# Altium PCB PWR Board 10A.PcbDoc (part 1 of 10)
Units mm, origin at the board's own origin, x right, y up, seen from the top; angles counter-clockwise.
Board outline 355 x 325 mm, 4 copper layers (Top Layer, Layer 1, Layer 2, Bottom Layer), stack 1.636 mm thick; 617 components, 308 nets, 1518 pads, 1199 vias.
Unrouted connection lines stored in the file: 361.
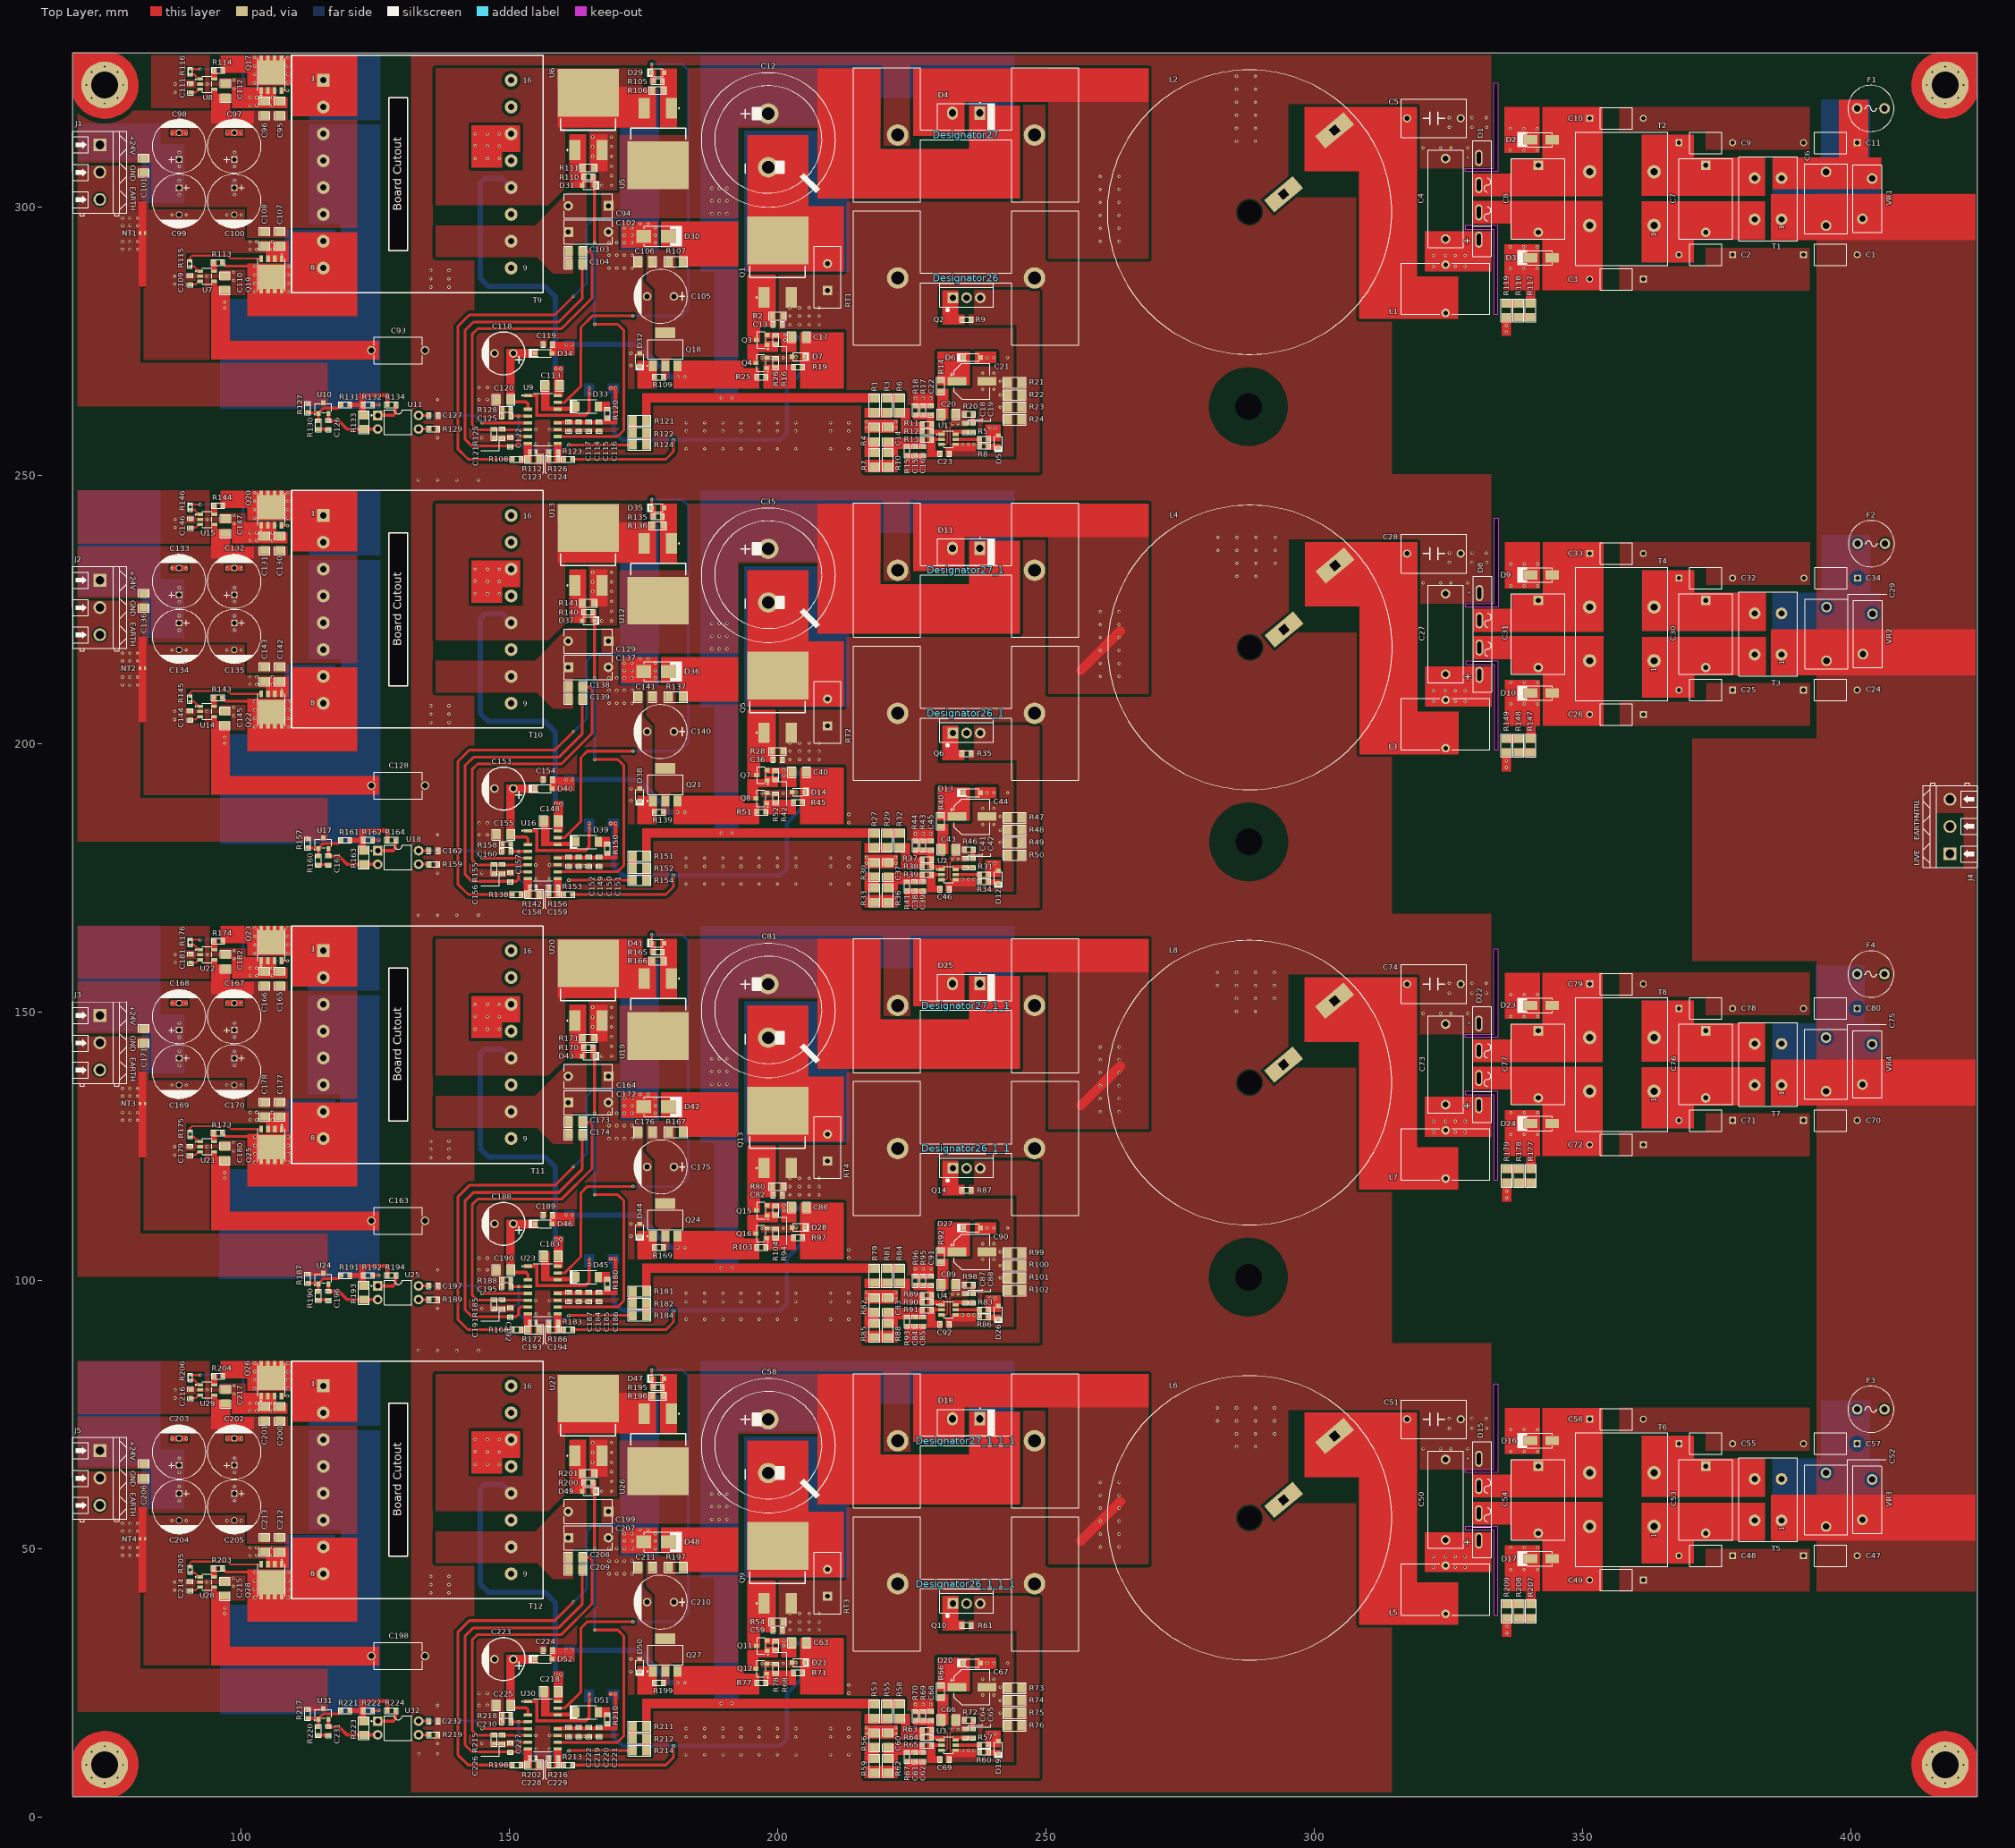
[diagram p0: Top Layer view]
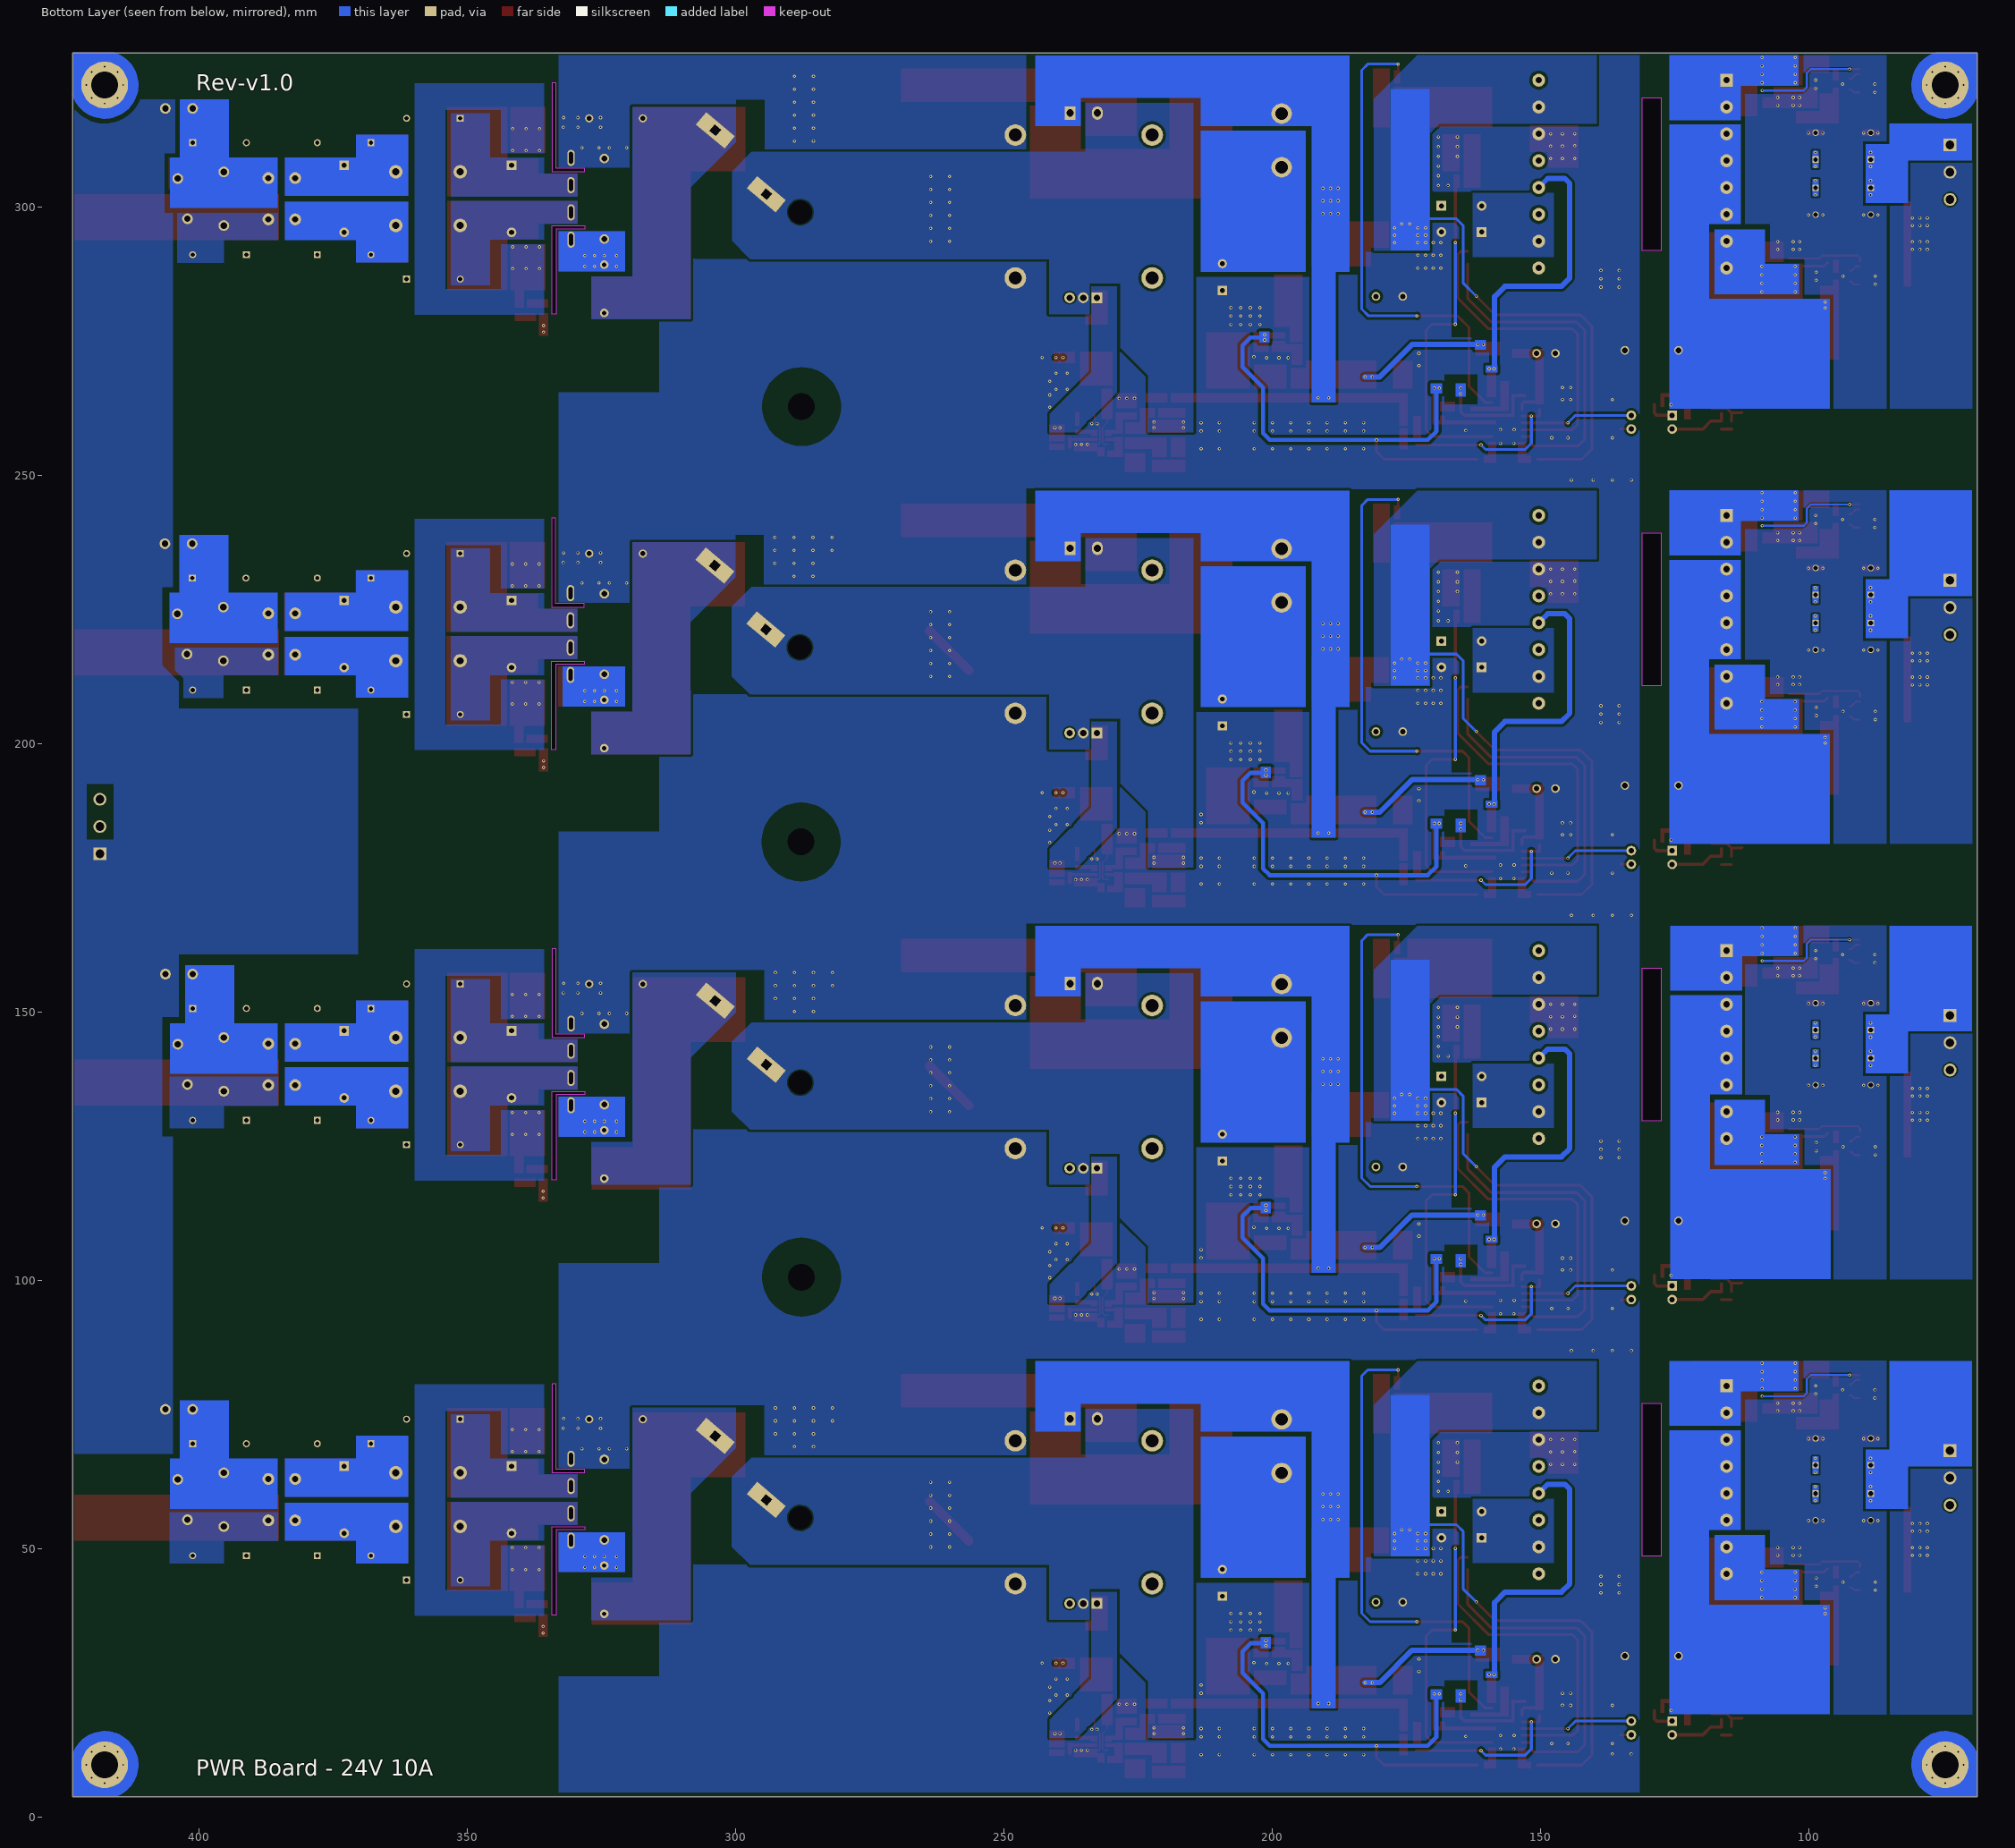
[diagram p1: Bottom Layer view, seen from below]
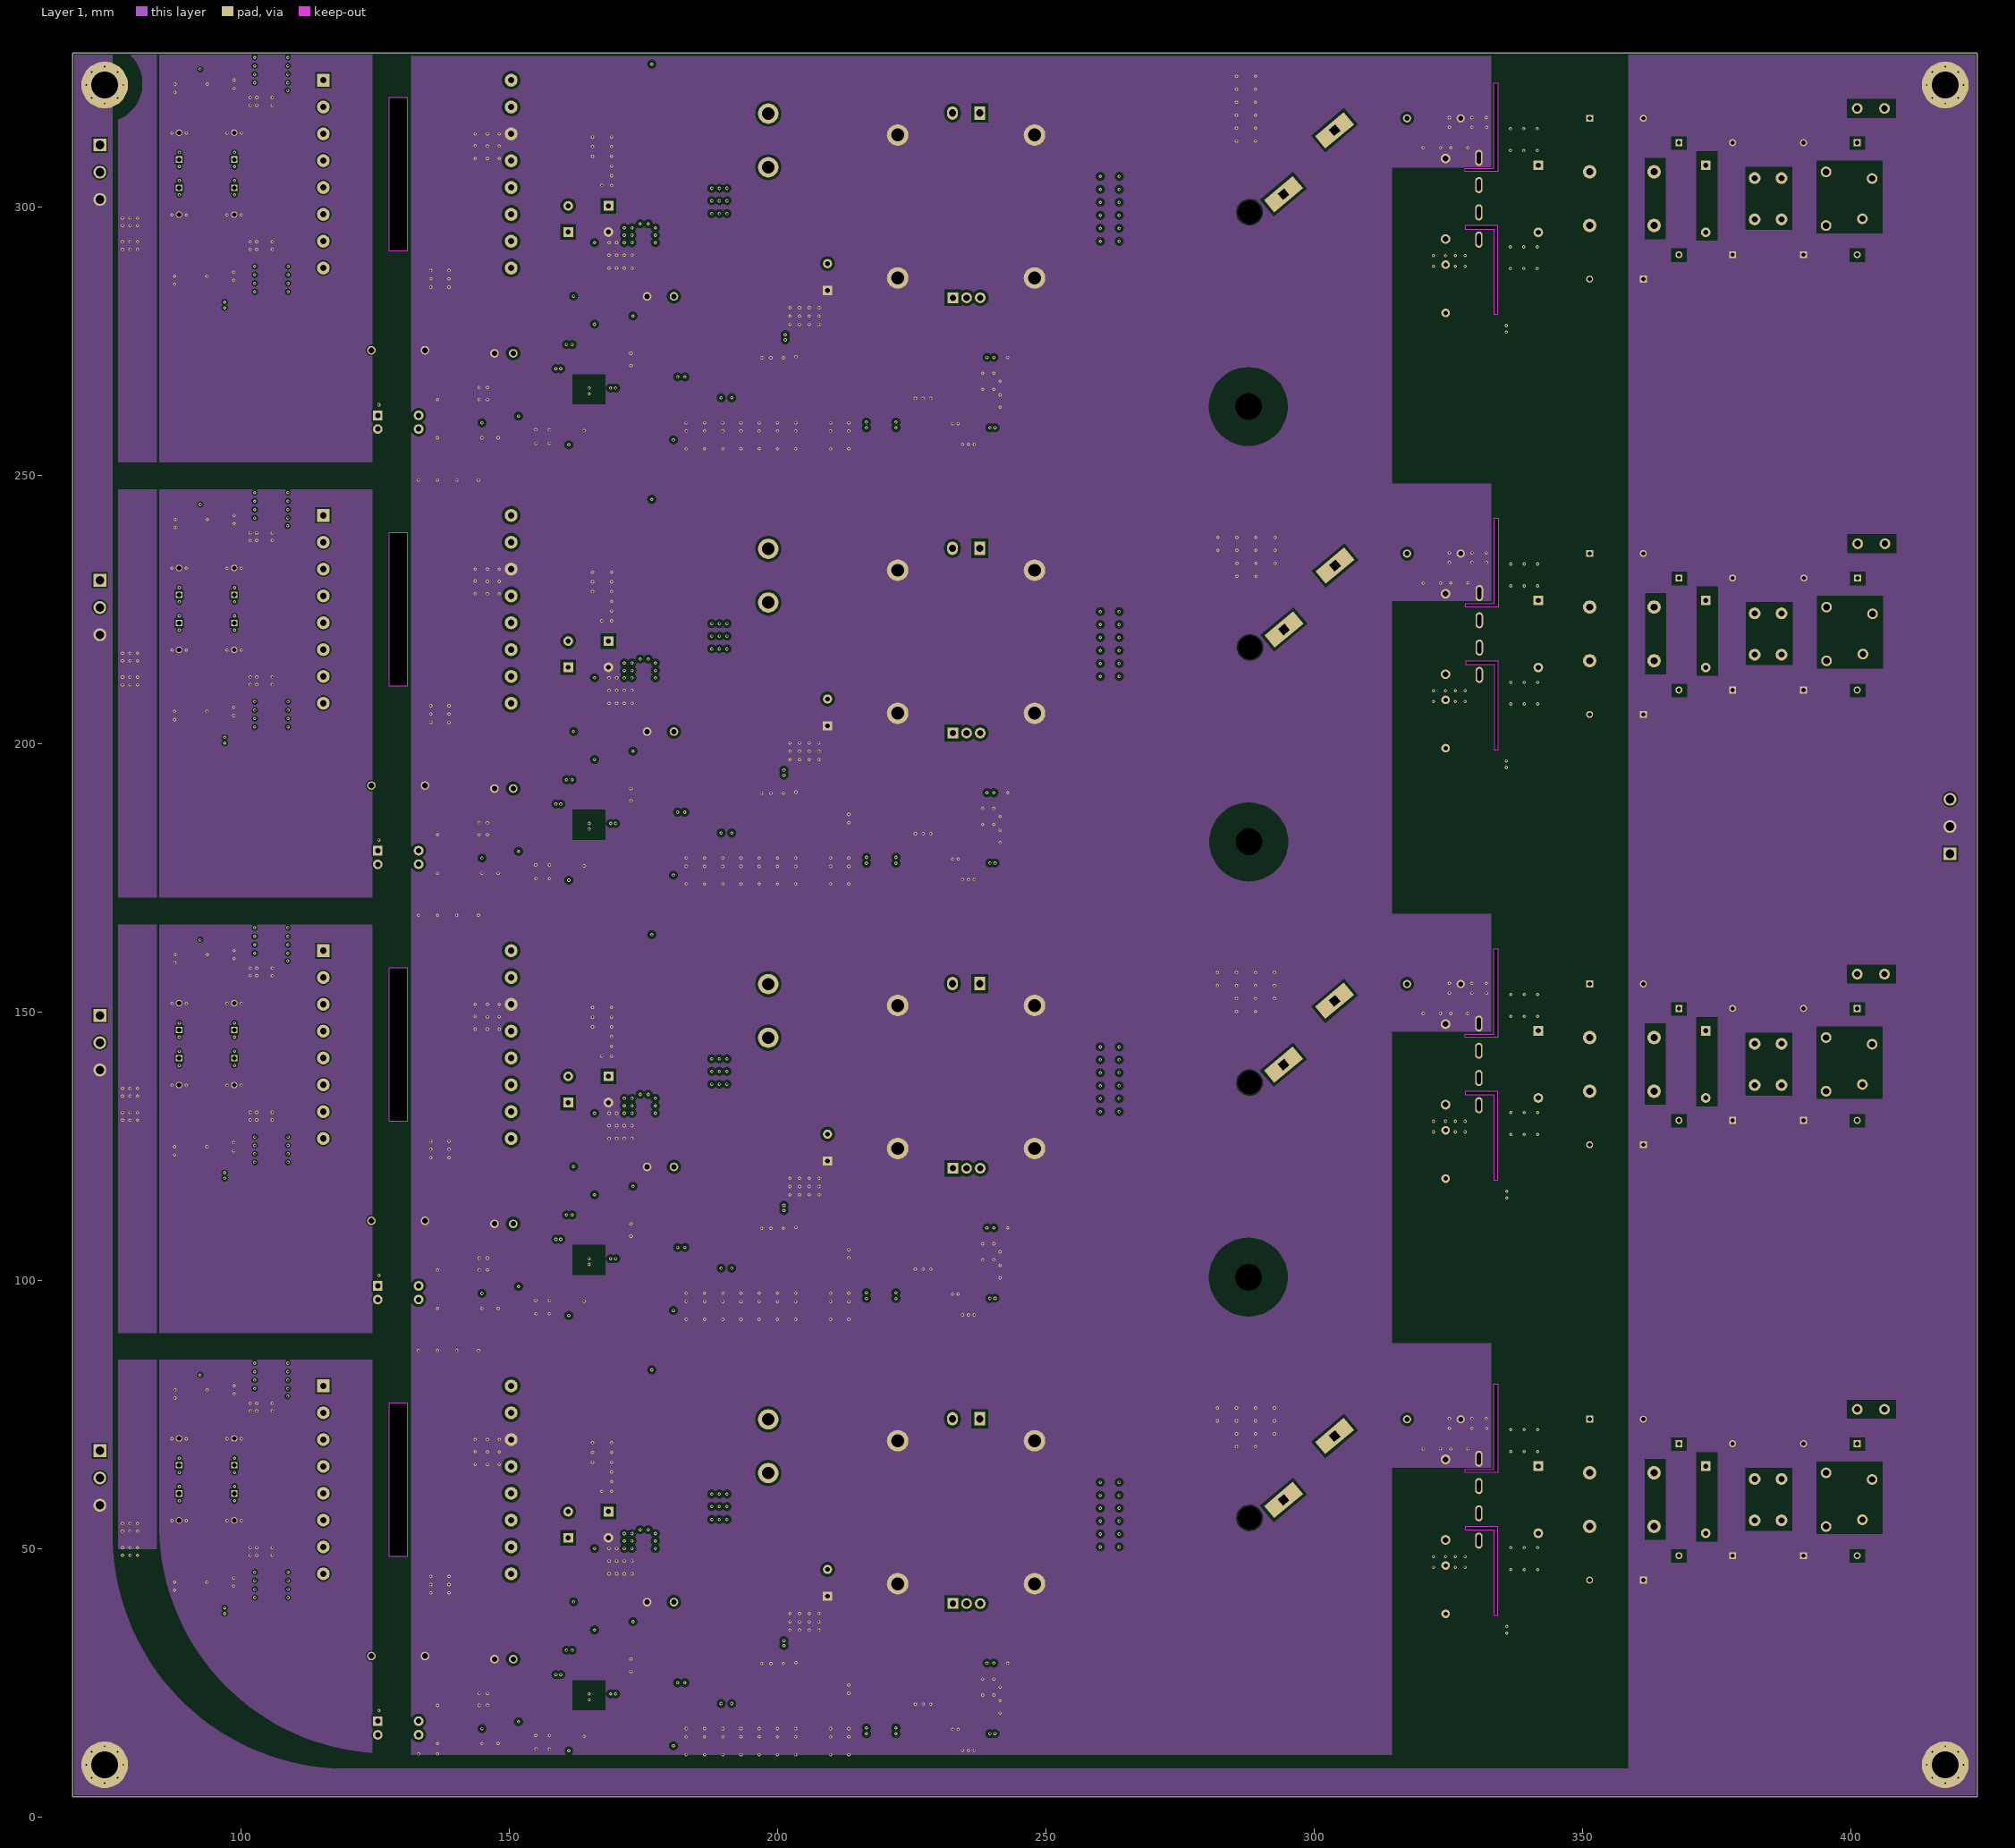
[diagram p2: Layer 1]
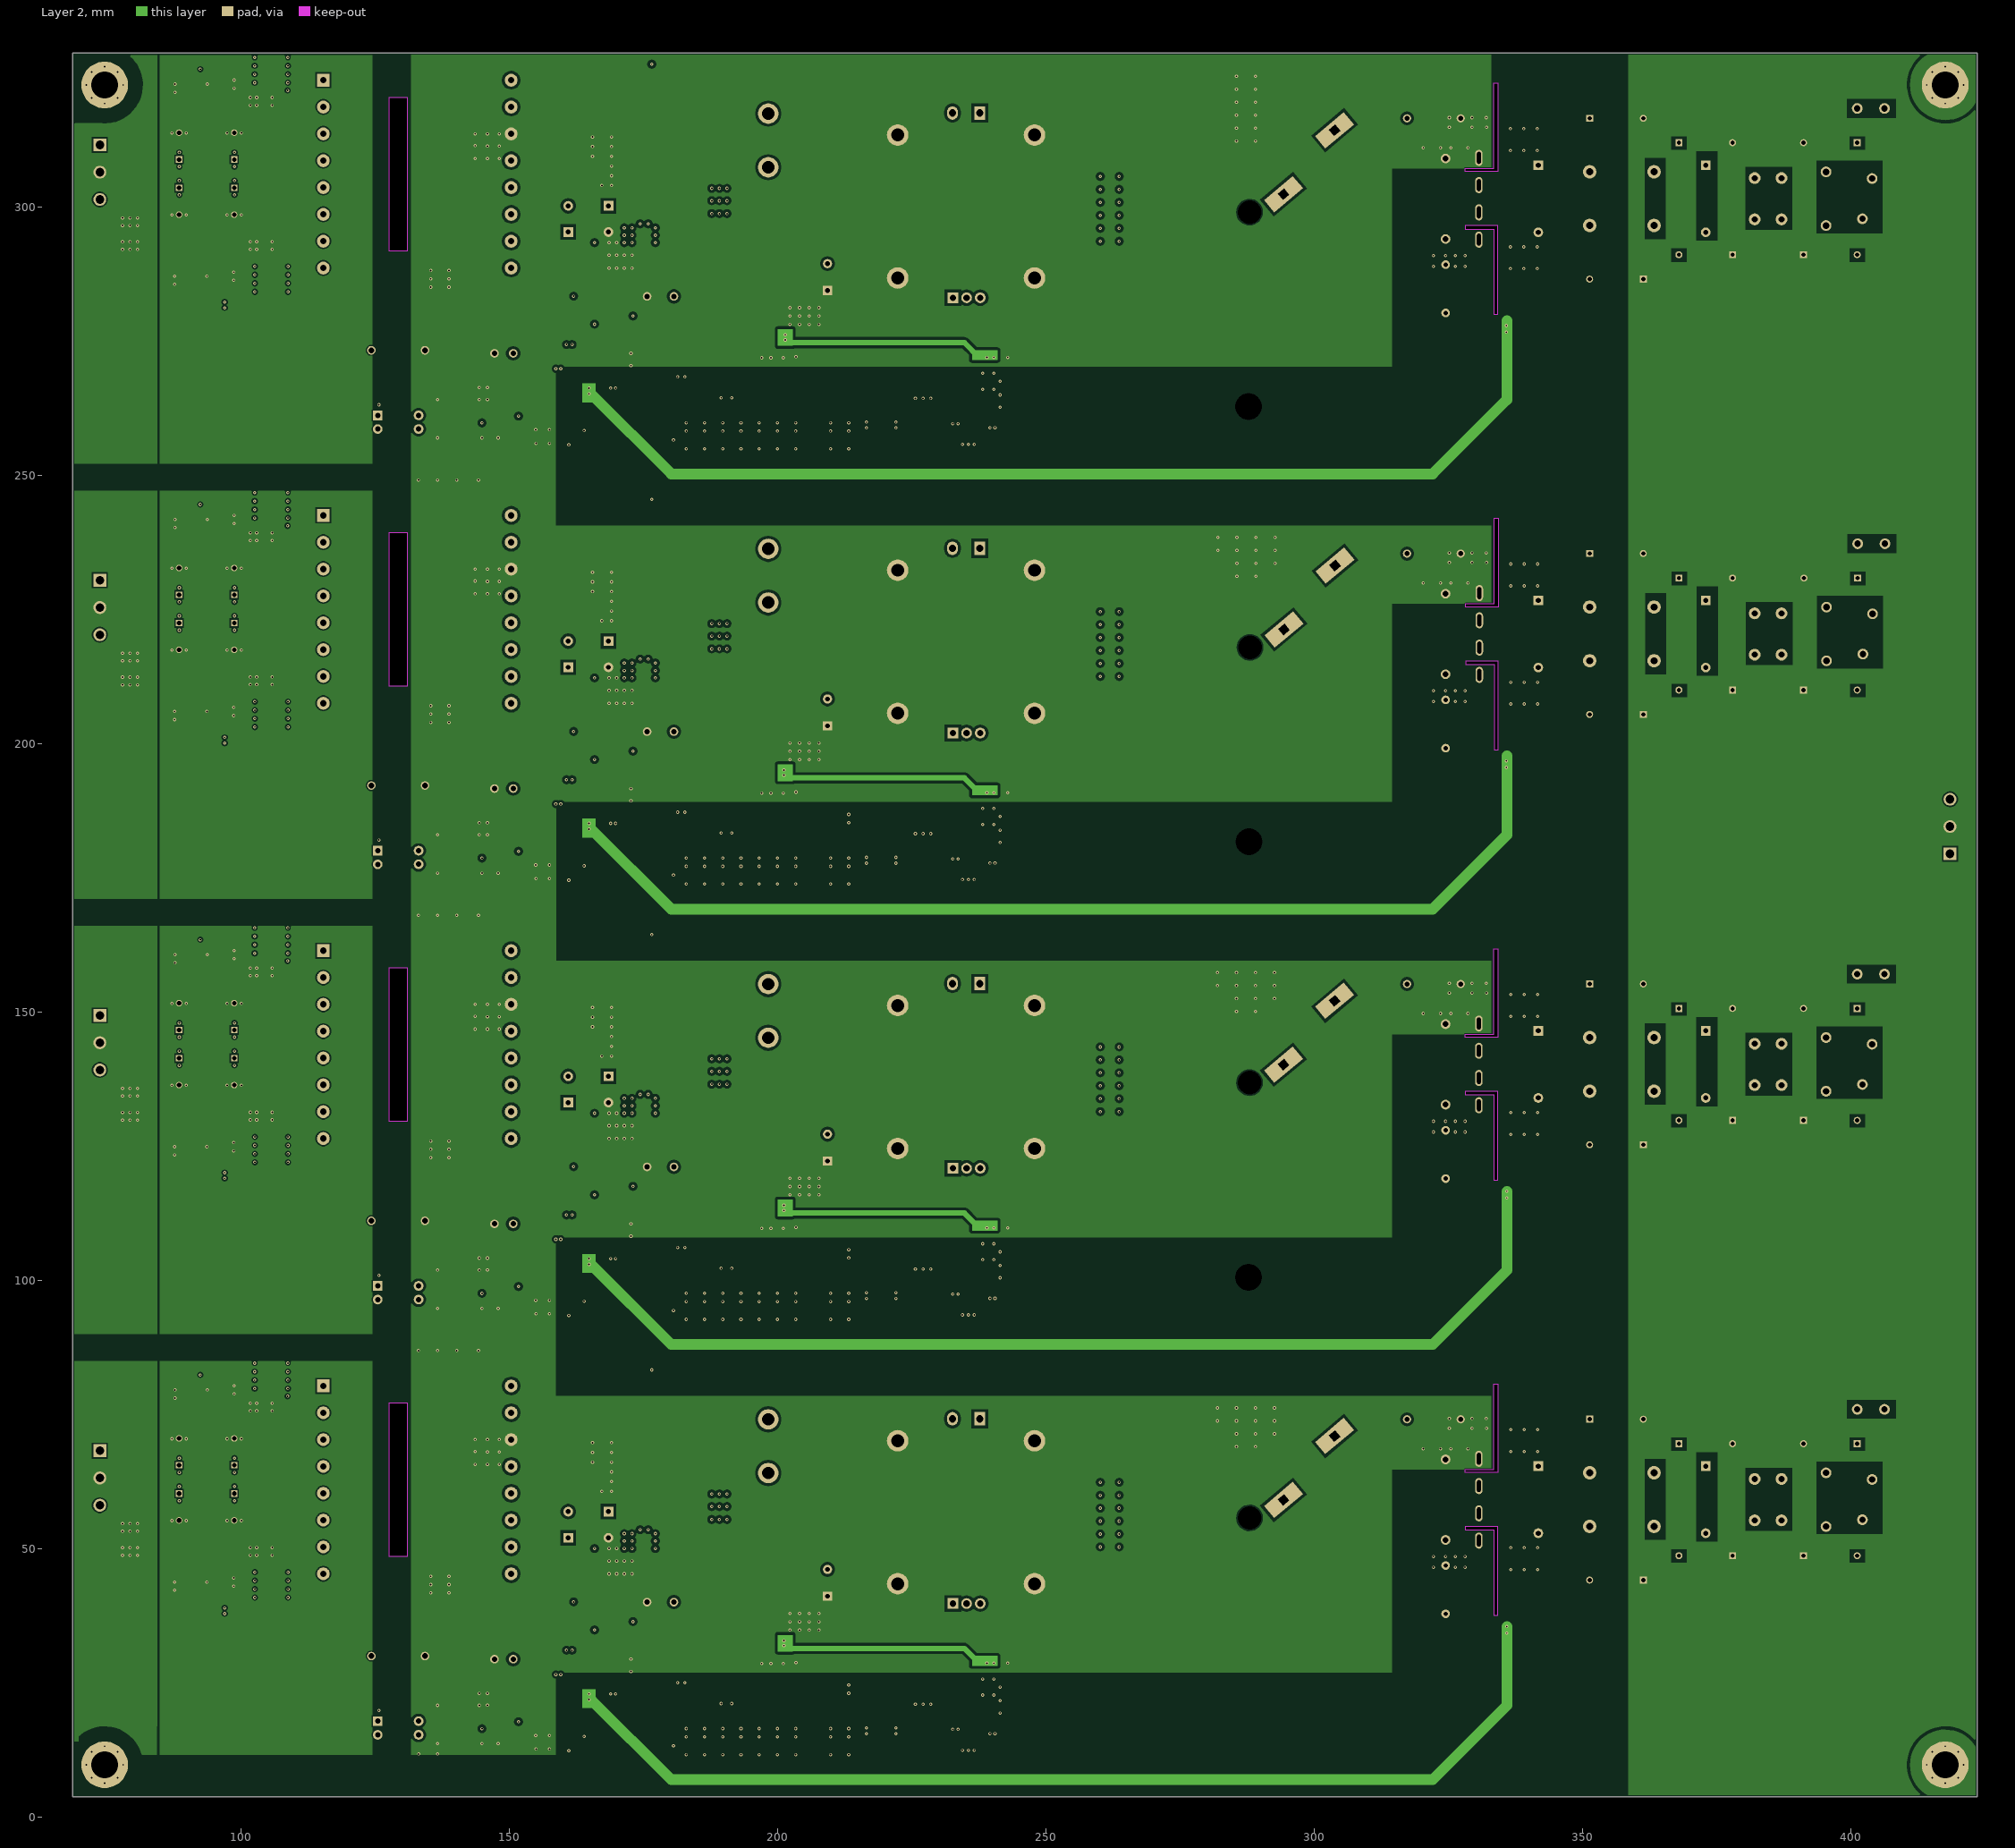
[diagram p3: Layer 2]
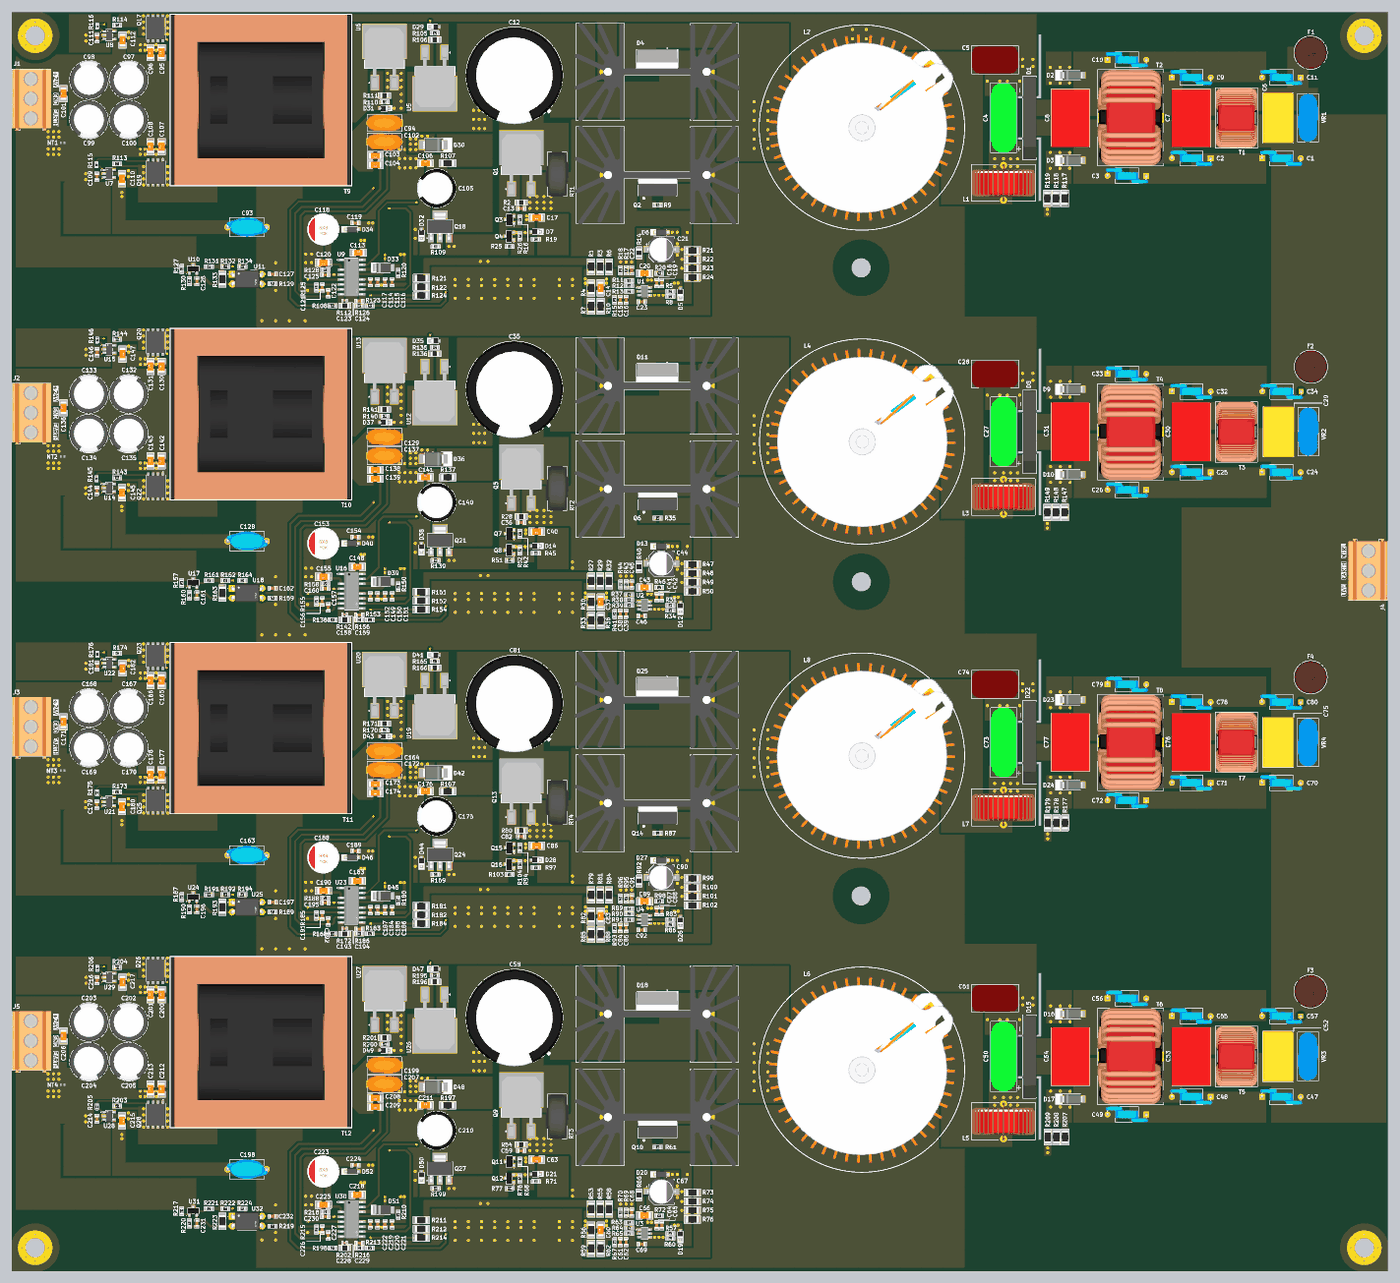
[diagram p9: 3D render of the assembled board from above, using the file's embedded part models]

## Layer stack, top to bottom
Top Solder: solder mask 0.0102, Solder Resist, Dk 3.5
Top Layer: signal copper 0.07
Dielectric 2: prepreg 0.203, PP-006, Dk 4.1
Layer 1: signal copper 0.03
Dielectric 1: core 1.03, FR-4, Dk 4.8
Layer 2: signal copper 0.03
Dielectric 3: prepreg 0.203, PP-006, Dk 4.1
Bottom Layer: signal copper 0.07
Bottom Solder: solder mask 0.0102, Solder Resist, Dk 3.5

## Board outline
68.618,3.682 68.618,328.682 423.618,328.682 423.618,3.682
cut-out: 328.137,295.845 333.492,295.845 333.492,279.935 334.239,279.935 334.239,296.445 328.137,296.445
cut-out: 328.137,306.525 328.137,307.125 333.492,307.125 333.492,323.035 334.239,323.035 334.239,306.525
cut-out: 328.224,214.742 333.579,214.742 333.579,198.832 334.326,198.832 334.326,215.342 328.224,215.342
cut-out: 328.224,225.422 328.224,226.022 333.579,226.022 333.579,241.932 334.326,241.932 334.326,225.422
cut-out: 328.137,53.441 333.492,53.441 333.492,37.531 334.239,37.531 334.239,54.041 328.137,54.041
cut-out: 328.137,64.121 328.137,64.721 333.492,64.721 333.492,80.631 334.239,80.631 334.239,64.121
cut-out: 328.137,145.223 328.137,145.823 333.492,145.823 333.492,161.734 334.239,161.734 334.239,145.223
cut-out: 328.137,134.544 333.492,134.544 333.492,118.633 334.239,118.633 334.239,135.144 328.137,135.144

## Design rules (kind name [scope] priority, off if disabled: settings)
BoardOutlineClearance [All] p1: gap=0 ignorepadtopadclearanceinfootprint=FALSE except(0.381: Poly-OutlineEdge)
Clearance "GND Clearance" [InNet('GND')] p1: gap=0.254 ignorepadtopadclearanceinfootprint=FALSE except(0.508: Arc-Poly Track-Poly SMDPad-Poly THPad-Poly Via-Poly Fill-Poly Poly-Poly)
Clearance [All] p2: gap=0.254 ignorepadtopadclearanceinfootprint=FALSE
ComponentClearance [All] p1: gap=0 collisioncheckmode=3 verticalgap=0 showdistances=FALSE
Height [All] p1: minheight=0 maxheight=40.5 prefheight=1.016
HoleSize [All] p1: absolutevalues=TRUE maxlimit=5.5 minlimit=0.025 maxpercent=80.000 minpercent=20.000
MinimumSolderMaskSliver [All] p1: minsoldermaskwidth=0
PolygonConnect [All] p1: connectstyle=Direct reliefconductorwidth=0.254 reliefentries=4 polygonreliefangle="90 Angle" airgapwidth=0.254
RoutingVias [All] p1: holewidth=0.3 width=0.6 viastyle="Through Hole" minholewidth=0.3 minwidth=0.6 maxholewidth=0.3 maxwidth=0.6
SilkToSilkClearance [All] p1: silktosilkclearance=0
SilkToSolderMaskClearance [IsPad] p1: minsilkscreentomaskgap=0 clearancetoexposedcopper=TRUE
SolderMaskExpansion [All] p1: expansion=0.102 istentingtop=FALSE
SupplyNets "Schematic Supply Nets_7" [InNet('GND')] p1: voltage=0.000
SupplyNets "Schematic Supply Nets_6" [InNet('SGND-C1')] p2: voltage=0.000
SupplyNets "Schematic Supply Nets_5" [InNet('SGND-C3')] p3: voltage=0.000
SupplyNets "Schematic Supply Nets_4" [InNet('SGND-C4')] p4: voltage=0.000
SupplyNets "Schematic Supply Nets_3" [InNet('EARTH')] p5: voltage=0.000
SupplyNets "Schematic Supply Nets_2" [InNet('SGND-C2')] p6: voltage=0.000
SupplyNets "Schematic Supply Nets_1" [InNet('AC_N')] p7: voltage=0.000
SupplyNets "Schematic Supply Nets" [InNet('AC_L')] p8: voltage=0.000
UnRoutedNet [All] p1: checkbadconnections=TRUE
Width [All] p1: maxlimit=2 minlimit=0.203 preferedwidth=0.254 toplayer_minwidth=0.203 minimp=50.000000 maximp=50.000000 favimp=50.000000
23 further rules are at their usual default settings.

## Classes and differential pairs
component class U_Power_Sheet4: C47 C48 C49 C50 C51 C52 C53 C54 C55 C56 C57 C58 C59 C60 C61 C62 C63 C64 C65 C66 C67 C68 C69 D15 D16 D17 D18 D19 D20 D21 F3 L5 L6 Q9 Q10 Q11 Q12 R53 R54 R55 R56 R57 R58 R59 R60 R61 R62 R63 R64 R65 R66 R67 R68 R69 R70 R71 R72 R73 R74 R75 R76 R77 R78 RT3 T5 T6 U3 VR3
component class U_Power_Sheet3: C70 C71 C72 C73 C74 C75 C76 C77 C78 c79 C80 C81 C82 C83 C84 C85 C86 C87 C88 C89 C90 C91 C92 D22 D23 D24 D25 D26 D27 D28 F4 L7 L8 Q13 Q14 Q15 Q16 R79 R80 R81 R82 R83 R84 R85 R86 R87 R88 R89 R90 R91 R92 R93 R94 R95 R96 R97 R98 R99 R100 R101 R102 R103 R104 RT4 T7 T8 U4 VR4
component class U_Power_Sheet2: C24 C25 C26 C27 C28 C29 C30 C31 C32 C33 C34 C35 C36 C37 C38 C39 C40 C41 C42 C43 C44 C45 C46 D8 D9 D10 D11 D12 D13 D14 F2 L3 L4 Q5 Q6 Q7 Q8 R27 R28 R29 R30 R31 R32 R33 R34 R35 R36 R37 R38 R39 R40 R41 R42 R43 R44 R45 R46 R47 R48 R49 R50 R51 R52 T3 T4 U2 VR2
component class U_Power_Sheet1: C1 C2 C3 C4 C5 C7 C8 C9 C10 C11 C12 C13 C14 C15 C16 C17 C18 C19 C20 C21 C22 C23 D1 D2 D3 D4 D5 D6 D7 F1 L1 L2 Q1 Q2 Q3 Q4 R1 R2 R3 R4 R5 R6 R7 R8 R9 R10 R11 R12 R13 R14 R15 R16 R17 R18 R19 R20 R21 R22 R23 R24 R25 R26 RT1 T1 T2 U1 VR1
component class U_Connector_Sheet: J2 J3 J4
component class U_24V_Sheet4: C198 C199 C200 C201 C202 C203 C204 C205 C206 C207 C208 C209 C210 C211 C212 C213 C214 C215 C216 C217 C218 C219 C220 C221 C222 C223 C224 C225 C226 C227 C228 C229 C230 C231 C232 D47 D48 D49 D50 D51 D52 NT4 Q26 Q27 Q28 R195 R196 R197 R198 R199 R200 R201 R202 R203 R204 R205 R206 R207 R208 R209 R210 R211 R212 R213 R214 R215 R216 R217 R218 R219 R220 R221 R222 R223 R224 T12 U26 U27 U28 U29 U30 U31 U32
component class U_24V_Sheet3: C163 C164 C165 C166 C167 C168 C169 C170 C171 C172 C173 C174 C175 C176 C177 C178 C179 C180 C181 C182 C183 C184 C185 C186 C187 C188 C189 C190 C191 C192 C193 C194 C195 C196 C197 D41 D42 D43 D44 D45 D46 NT3 Q23 Q24 Q25 R165 R166 R167 R168 R169 R170 R171 R172 R173 R174 R175 R176 R177 R178 R179 R180 R181 R182 R183 R184 R185 R186 R187 R188 R189 R190 R191 R192 R193 R194 T11 U19 U20 U21 U22 U23 U24 U25
component class U_24V_Sheet2: C128 C129 C130 C131 C133 C134 C135 C136 C137 C138 C139 C140 C141 C142 C143 C144 C145 C146 C147 C148 C149 C150 C151 C152 C153 C154 C155 C156 C157 C158 C159 C160 C161 C162 D35 D36 D37 D38 D39 D40 NT2 Q20 Q21 Q22 R135 R136 R137 R138 R139 R140 R141 R142 R143 R144 R145 R146 R147 R148 R149 R150 R151 R152 R153 R154 R155 R156 R157 R158 R159 R160 R161 R162 R163 R164 T10 U12 U13 U14 U15 U16 U17 U18
component class U_24V_Sheet1: C93 C94 C95 C96 C97 C98 C99 C100 C101 C102 C103 C104 C105 C106 C107 C108 C109 C110 C111 C112 C113 C114 C115 C116 C117 C118 C119 C120 C121 C122 C123 C124 C125 C126 C127 D29 D30 D31 D32 D33 D34 NT1 Q17 Q18 Q19 R105 R106 R107 R108 R109 R110 R111 R112 R113 R114 R115 R116 R117 R118 R119 R120 R121 R122 R123 R124 R125 R126 R127 R128 R129 R130 R131 R132 R133 R134 T9 U5 U6 U7 U8 U9 U10 U11

## Components (designator, comment, footprint, x,y, rotation, side; value= is the part's Value field where it differs from the comment)
C1 "100pF" DE1B3RA101KN4AN01F 396.214,291.052 r0 top
C2 "220pF" DE1B3RA221KN4AN01F 372.976,291.052 r180 top
C3 "220pF" DE1B3RA221KN4AN01F 356.347,286.505 r180 top
C4 "470nF" 450MPK474J 324.51,301.485 r270 top
C5 "MPP105J2W10KN22605" MPP105J2W10KN22605 322.319,316.466 r180 top
C6 "220nF" X2P2224KN1B0130150080ES0 395.405,301.486 r270 top
C7 "0.47UF" 890324024005 372.976,301.485 r270 top
C8 "0.47UF" 890324024005 341.782,301.485 r270 top
C9 "220pF" DE1B3RA221KN4AN01F 372.976,311.918 r0 top
C10 "220pF" DE1B3RA221KN4AN01F 356.347,316.477 r0 top
C11 "100pF" DE1B3RA101KN4AN01F 396.214,311.918 r180 top
C12 "150uF" KN151M45025*30A 198.284,312.352 r270 top
C13 "0.1uF" Cap-0603 200.052,278.077 r180 top value=100nF
C14 "10pF" Cap-1206 220.555,257.551 r90 top
C15 "3.9nF" Cap-0603 225.631,254.469 r90 top
C16 "560pF" Cap-0603 227.104,254.469 r90 top
C17 "470nF" Cap-1206 204.038,275.74 r180 top
C18 "68nF" Cap-0603 235.035,258.813 r270 top
C19 "0.22uF" Cap-0603 236.356,258.813 r270 top
C20 "0.47uF" Cap-1206 231.879,261.327 r180 top
C21 "10uF" 50SVPF10M 236.237,267.474 r0 top
C22 "06031C102KAT2A" Cap-0603 228.552,262.089 r270 top
C23 "10pF" Cap-0603 231.143,253.966 r0 top
C24 "100pF" DE1B3RA101KN4AN01F 396.214,209.949 r0 top
C25 "220pF" DE1B3RA221KN4AN01F 372.976,209.949 r180 top
C26 "220pF" DE1B3RA221KN4AN01F 356.347,205.403 r180 top
C27 "470nF" 450MPK474J 324.51,220.382 r270 top
C28 "MPP105J2W10KN22605" MPP105J2W10KN22605 322.319,235.363 r180 top
C29 "220nF" X2P2224KN1B0130150080ES0 395.492,220.383 r270 top
C30 "0.47UF" 890324024005 372.976,220.383 r270 top
C31 "0.47UF" 890324024005 341.782,220.383 r270 top
C32 "220pF" DE1B3RA221KN4AN01F 372.976,230.816 r0 top
C33 "220pF" DE1B3RA221KN4AN01F 356.347,235.375 r0 top
C34 "100pF" DE1B3RA101KN4AN01F 396.301,230.815 r180 top
C35 "150uF" KN151M45025*30A 198.284,231.249 r270 top
C36 "0.1uF" Cap-0603 200.052,196.975 r180 top value=100nF
C37 "10pF" Cap-1206 220.555,176.448 r90 top
C38 "3.9nF" Cap-0603 225.631,173.367 r90 top
C39 "560pF" Cap-0603 227.104,173.367 r90 top
C40 "470nF" Cap-1206 204.038,194.638 r180 top
C41 "68nF" Cap-0603 235.035,177.71 r270 top
C42 "0.22uF" Cap-0603 236.356,177.71 r270 top
C43 "0.47uF" Cap-1206 231.879,180.225 r180 top
C44 "10uF" 50SVPF10M 236.237,186.372 r0 top
C45 "06031C102KAT2A" Cap-0603 228.552,180.987 r270 top
C46 "10pF" Cap-0603 231.143,172.864 r0 top
C47 "100pF" DE1B3RA101KN4AN01F 396.214,48.648 r0 top
C48 "220pF" DE1B3RA221KN4AN01F 372.976,48.648 r180 top
C49 "220pF" DE1B3RA221KN4AN01F 356.347,44.101 r180 top
C50 "470nF" 450MPK474J 324.51,59.081 r270 top
C51 "MPP105J2W10KN22605" MPP105J2W10KN22605 322.319,74.062 r180 top
C52 "220nF" X2P2224KN1B0130150080ES0 395.405,59.082 r270 top
C53 "0.47UF" 890324024005 372.976,59.081 r270 top
C54 "0.47UF" 890324024005 341.782,59.081 r270 top
C55 "220pF" DE1B3RA221KN4AN01F 372.976,69.514 r0 top
C56 "220pF" DE1B3RA221KN4AN01F 356.347,74.073 r0 top
C57 "100pF" DE1B3RA101KN4AN01F 396.214,69.514 r180 top
C58 "150uF" KN151M45025*30A 198.284,69.045 r270 top
C59 "0.1uF" Cap-0603 200.052,34.77 r180 top value=100nF
C60 "10pF" Cap-1206 220.555,14.243 r90 top
C61 "3.9nF" Cap-0603 225.631,11.162 r90 top
C62 "560pF" Cap-0603 227.104,11.162 r90 top
C63 "470nF" Cap-1206 204.038,32.433 r180 top
C64 "68nF" Cap-0603 235.035,15.506 r270 top
C65 "0.22uF" Cap-0603 236.356,15.506 r270 top
C66 "0.47uF" Cap-1206 231.879,18.02 r180 top
C67 "10uF" 50SVPF10M 236.237,24.167 r0 top
C68 "06031C102KAT2A" Cap-0603 228.552,18.782 r270 top
C69 "10pF" Cap-0603 231.143,10.659 r0 top
C70 "100pF" DE1B3RA101KN4AN01F 396.214,129.75 r0 top
C71 "220pF" DE1B3RA221KN4AN01F 372.976,129.75 r180 top
C72 "220pF" DE1B3RA221KN4AN01F 356.347,125.203 r180 top
C73 "470nF" 450MPK474J 324.51,140.183 r270 top
C74 "MPP105J2W10KN22605" MPP105J2W10KN22605 322.319,155.164 r180 top
C75 "220nF" X2P2224KN1B0130150080ES0 395.405,140.185 r270 top
C76 "0.47UF" 890324024005 372.976,140.183 r270 top
C77 "0.47UF" 890324024005 341.782,140.183 r270 top
C78 "220pF" DE1B3RA221KN4AN01F 372.976,150.617 r0 top
C79 "220pF" DE1B3RA221KN4AN01F 356.347,155.175 r0 top
C80 "100pF" DE1B3RA101KN4AN01F 396.214,150.617 r180 top
C81 "150uF" KN151M45025*30A 198.284,150.147 r270 top
C82 "0.1uF" Cap-0603 200.052,115.872 r180 top value=100nF
C83 "10pF" Cap-1206 220.555,95.346 r90 top
C84 "3.9nF" Cap-0603 225.631,92.265 r90 top
C85 "560pF" Cap-0603 227.104,92.265 r90 top
C86 "470nF" Cap-1206 204.038,113.535 r180 top
C87 "68nF" Cap-0603 235.035,96.608 r270 top
C88 "0.22uF" Cap-0603 236.356,96.608 r270 top
C89 "0.47uF" Cap-1206 231.879,99.123 r180 top
C90 "10uF" 50SVPF10M 236.237,105.269 r0 top
C91 "06031C102KAT2A" Cap-0603 228.552,99.885 r270 top
C92 "10pF" Cap-0603 231.143,91.762 r0 top
C93 "2.2nF" DE1E3RA222MA4BN01F 129.315,273.246 r180 top
C94 "KP223J2J0701" KP223J2J0701 164.755,300.159 r180 top
C95 "4.7uF" Cap-1206 107.246,318.32 r90 top
C96 "4.7uF" Cap-1206 104.394,318.32 r90 top
C97 "680uF" EEU-FR1V681B 98.756,311.293 r90 top
C98 "680uF" EEU-FR1V681B 88.484,311.293 r90 top
C99 "680uF" EEU-FR1V681B 88.484,301.031 r270 top
C100 "680uF" EEU-FR1V681B 98.756,301.031 r270 top
C101 "0.1uF" Cap-1206 81.89,307.7 r90 top value=100nF
C102 "KP223J2J0701" KP223J2J0701 164.755,295.283 r0 top
C103 "150pF" Cap-1206 162.379,291.647 r180 top
C104 "100pF" Cap-1206 162.379,289.361 r180 top
C105 "470uF" EEUFR1V471B 178.201,283.293 r180 top
C106 "2.2uF" Cap-1206 175.335,289.77 r0 top
C107 "4.7uF" Cap-1206 107.246,293.987 r90 top
C108 "4.7uF" Cap-1206 104.394,293.987 r90 top
C109 "2.2uF" CAP-0603 90.5,286.29 r270 top
C110 "0.1uF" Cap-1206 97.028,285.782 r270 top value=100nF
C111 "2.2uF" CAP-0603 90.602,322.079 r270 top
C112 "0.1uF" Cap-1206 97.13,321.571 r270 top value=100nF
C113 "2.2uF" Cap-1206 158.004,266.651 r0 top
C114 "4.7uF" Cap-0603 162.992,259.036 r90 top
C115 "4.7uF" Cap-0603 164.871,259.036 r90 top
C116 "4.7uF" Cap-0603 166.751,259.036 r90 top
C117 "0.01uF" Cap-0603 161.112,259.036 r90 top
C118 "330uF" RC035M331LO8*14TH-2A1E 148.996,272.676 r180 top
C119 "2.2uF" Cap-0603 157.226,274.327 r0 top
C120 "1uF" Cap-1206 148.967,264.065 r180 top
C121 "220pF" Cap-0603 148.713,257.69 r90 top
C122 "10nF" Cap-0603 150.241,256.166 r270 top
C123 "47pF" Cap-0402 154.47,254.312 r180 top
C124 "82nF" Cap-0603 158.274,254.185 r0 top
C125 "4.7nF" Cap-0603 149.475,260.992 r0 top
C126 "470pF" Cap-0603 116.323,259.287 r270 top
C127 "47pF" Cap-0603 135.89,261.119 r0 top
C128 "2.2nF" DE1E3RA222MA4BN01F 129.315,192.144 r180 top
C129 "KP223J2J0701" KP223J2J0701 164.755,219.057 r180 top
C130 "4.7uF" Cap-1206 107.246,237.268 r90 top
C131 "4.7uF" Cap-1206 104.394,237.268 r90 top
C132 "680uF" EEU-FR1V681B 98.756,230.19 r90 top
C133 "680uF" EEU-FR1V681B 88.484,230.19 r90 top
C134 "680uF" EEU-FR1V681B 88.484,219.929 r270 top
C135 "680uF" EEU-FR1V681B 98.756,219.929 r270 top
C136 "0.1uF" Cap-1206 81.89,226.598 r90 top value=100nF
C137 "KP223J2J0701" KP223J2J0701 164.755,214.18 r0 top
C138 "150pF" Cap-1206 162.379,210.544 r180 top
C139 "100pF" Cap-1206 162.379,208.258 r180 top
C140 "470uF" EEUFR1V471B 178.201,202.191 r180 top
C141 "2.2uF" Cap-1206 175.335,208.668 r0 top
C142 "4.7uF" Cap-1206 107.246,212.884 r90 top
C143 "4.7uF" Cap-1206 104.394,212.884 r90 top
C144 "2.2uF" CAP-0603 90.5,205.188 r270 top
C145 "0.1uF" Cap-1206 97.028,204.68 r270 top value=100nF
C146 "2.2uF" CAP-0603 90.602,240.977 r270 top
C147 "0.1uF" Cap-1206 97.13,240.469 r270 top value=100nF
C148 "2.2uF" Cap-1206 157.75,185.555 r0 top
C149 "4.7uF" Cap-0603 162.992,177.94 r90 top
C150 "4.7uF" Cap-0603 164.871,177.94 r90 top
C151 "4.7uF" Cap-0603 166.751,177.94 r90 top
C152 "0.01uF" Cap-0603 161.112,177.94 r90 top
C153 "330uF" RC035M331LO8*14TH-2A1E 148.996,191.58 r180 top
C154 "2.2uF" Cap-0603 157.226,193.231 r0 top
C155 "1uF" Cap-1206 148.967,182.969 r180 top
C156 "220pF" Cap-0603 148.713,176.594 r90 top
C157 "10nF" Cap-0603 150.237,175.07 r270 top
C158 "47pF" Cap-0402 154.47,173.216 r180 top
C159 "82nF" Cap-0603 158.274,173.089 r0 top
C160 "4.7nF" Cap-0603 149.475,179.896 r0 top
C161 "470pF" Cap-0603 116.323,178.185 r270 top
C162 "47pF" Cap-0603 135.89,180.016 r0 top
C163 "2.2nF" DE1E3RA222MA4BN01F 129.315,111.042 r180 top
C164 "KP223J2J0701" KP223J2J0701 164.755,137.955 r180 top
C165 "4.7uF" Cap-1206 107.246,156.166 r90 top
C166 "4.7uF" Cap-1206 104.394,156.166 r90 top
C167 "680uF" EEU-FR1V681B 98.756,149.088 r90 top
C168 "680uF" EEU-FR1V681B 88.484,149.088 r90 top
C169 "680uF" EEU-FR1V681B 88.484,138.826 r270 top
C170 "680uF" EEU-FR1V681B 98.756,138.826 r270 top
C171 "0.1uF" Cap-1206 81.89,145.495 r90 top value=100nF
C172 "KP223J2J0701" KP223J2J0701 164.755,133.078 r0 top
C173 "150pF" Cap-1206 162.379,129.442 r180 top
C174 "100pF" Cap-1206 162.379,127.156 r180 top
C175 "470uF" EEUFR1V471B 178.201,121.089 r180 top
C176 "2.2uF" Cap-1206 175.335,127.566 r0 top
C177 "4.7uF" Cap-1206 107.246,131.782 r90 top
C178 "4.7uF" Cap-1206 104.394,131.782 r90 top
C179 "2.2uF" CAP-0603 90.5,124.086 r270 top
C180 "0.1uF" Cap-1206 97.028,123.578 r270 top value=100nF
C181 "2.2uF" CAP-0603 90.602,159.874 r270 top
C182 "0.1uF" Cap-1206 97.13,159.366 r270 top value=100nF
C183 "2.2uF" Cap-1206 157.75,104.446 r0 top
C184 "4.7uF" Cap-0603 162.992,96.882 r90 top
C185 "4.7uF" Cap-0603 164.871,96.882 r90 top
C186 "4.7uF" Cap-0603 166.751,96.882 r90 top
C187 "0.01uF" Cap-0603 161.112,96.882 r90 top
C188 "330uF" RC035M331LO8*14TH-2A1E 148.996,110.471 r180 top
C189 "2.2uF" Cap-0603 157.226,112.122 r0 top
C190 "1uF" Cap-1206 148.967,101.861 r180 top
C191 "220pF" Cap-0603 148.713,95.485 r90 top
C192 "10nF" Cap-0603 150.237,93.961 r270 top
C193 "47pF" Cap-0402 154.47,92.107 r180 top
C194 "82nF" Cap-0603 158.274,91.98 r0 top
C195 "4.7nF" Cap-0603 149.475,98.787 r0 top
C196 "470pF" Cap-0603 116.323,97.082 r270 top
C197 "47pF" Cap-0603 135.89,98.914 r0 top
C198 "2.2nF" DE1E3RA222MA4BN01F 129.315,29.939 r180 top
C199 "KP223J2J0701" KP223J2J0701 164.755,56.852 r180 top
C200 "4.7uF" Cap-1206 107.246,75.064 r90 top
C201 "4.7uF" Cap-1206 104.394,75.064 r90 top
C202 "680uF" EEU-FR1V681B 98.756,67.986 r90 top
C203 "680uF" EEU-FR1V681B 88.484,67.986 r90 top
C204 "680uF" EEU-FR1V681B 88.484,57.724 r270 top
C205 "680uF" EEU-FR1V681B 98.756,57.724 r270 top
C206 "0.1uF" Cap-1206 81.89,64.393 r90 top value=100nF
C207 "KP223J2J0701" KP223J2J0701 164.755,51.976 r0 top
C208 "150pF" Cap-1206 162.379,48.34 r180 top
C209 "100pF" Cap-1206 162.379,46.054 r180 top
C210 "470uF" EEUFR1V471B 178.201,39.986 r180 top
C211 "2.2uF" Cap-1206 175.335,46.463 r0 top
C212 "4.7uF" Cap-1206 107.246,50.68 r90 top
C213 "4.7uF" Cap-1206 104.394,50.68 r90 top
C214 "2.2uF" CAP-0603 90.498,42.969 r270 top
C215 "0.1uF" Cap-1206 97.026,42.461 r270 top value=100nF
C216 "2.2uF" CAP-0603 90.602,78.772 r270 top
C217 "0.1uF" Cap-1206 97.13,78.264 r270 top value=100nF
C218 "2.2uF" Cap-1206 157.75,23.344 r0 top
C219 "4.7uF" Cap-0603 162.992,15.78 r90 top
C220 "4.7uF" Cap-0603 164.871,15.78 r90 top
C221 "4.7uF" Cap-0603 166.751,15.78 r90 top
C222 "0.01uF" Cap-0603 161.112,15.78 r90 top
C223 "330uF" RC035M331LO8*14TH-2A1E 148.996,29.369 r180 top
C224 "2.2uF" Cap-0603 157.226,31.02 r0 top
C225 "1uF" Cap-1206 148.967,20.758 r180 top
C226 "220pF" Cap-0603 148.713,14.383 r90 top
C227 "10nF" Cap-0603 150.237,12.859 r270 top
C228 "47pF" Cap-0402 154.47,11.005 r180 top
C229 "82nF" Cap-0603 158.274,10.878 r0 top
C230 "4.7nF" Cap-0603 149.475,17.685 r0 top
C231 "470pF" Cap-0603 116.323,15.98 r270 top
C232 "47pF" Cap-0603 135.89,17.812 r0 top
D1 "GBU806" GBU 330.708,301.485 r90 top
D2 "MURA160T3G" SMA 342.329,312.49 r0 top
D3 "MURA160T3G" SMA 342.329,290.48 r0 top
D4 "STTH8L06FP" TO-220-2 235.154,317.456 r180 top
D5 "MMDL914-TP" SOD-323 241.139,256.235 r90 top
D6 "1N4148W" SOD-123 236.237,271.919 r180 top
D7 "MMDL914-TP" SOD-323 203.835,272.038 r180 top
D8 "GBU806" GBU 330.795,220.382 r90 top
D9 "MURA160T3G" SMA 342.329,231.388 r0 top
D10 "MURA160T3G" SMA 342.329,209.378 r0 top
D11 "STTH8L06FP" TO-220-2 235.154,236.354 r180 top
D12 "MMDL914-TP" SOD-323 241.139,175.126 r90 top
D13 "1N4148W" SOD-123 236.237,190.817 r180 top
D14 "MMDL914-TP" SOD-323 203.835,190.935 r180 top
D15 "GBU806" GBU 330.708,59.081 r90 top
D16 "MURA160T3G" SMA 342.329,70.086 r0 top
D17 "MURA160T3G" SMA 342.329,48.076 r0 top
D18 "STTH8L06FP" TO-220-2 235.154,74.149 r180 top
D19 "MMDL914-TP" SOD-323 241.139,12.922 r90 top
D20 "1N4148W" SOD-123 236.237,28.612 r180 top
D21 "MMDL914-TP" SOD-323 203.835,28.731 r180 top
D22 "GBU806" GBU 330.708,140.184 r90 top
D23 "MURA160T3G" SMA 342.329,151.189 r0 top
D24 "MURA160T3G" SMA 342.329,129.178 r0 top
D25 "STTH8L06FP" TO-220-2 235.154,155.252 r180 top
D26 "MMDL914-TP" SOD-323 241.139,94.031 r90 top
D27 "1N4148W" SOD-123 236.237,109.714 r180 top
D28 "MMDL914-TP" SOD-323 203.835,109.833 r180 top
D29 "MMDL914-TP" SOD-323 177.724,324.975 r0 top
D30 "STPS160UY" SMB_ 177.385,294.495 r0 top
D31 "MMDL914-TP" SOD-323 164.755,303.955 r180 top
D32 "MMSZ5250BS-7-F" SOD-323 174.308,271.538 r90 top
D33 "ES1JAF" "DO-214AD (SMAF)" 164.564,262.77 r0 top value=15pF
D34 "1N4148W-7-F" SOD-123 156.413,272.676 r180 top value=2pF
D35 "MMDL914-TP" SOD-323 177.724,243.872 r0 top
D36 "STPS160UY" SMB_ 177.385,213.392 r0 top
D37 "MMDL914-TP" SOD-323 164.755,222.853 r180 top
D38 "MMSZ5250BS-7-F" SOD-323 174.308,190.436 r90 top
D39 "ES1JAF" "DO-214AD (SMAF)" 164.564,181.674 r0 top value=15pF
D40 "1N4148W-7-F" SOD-123 156.413,191.58 r180 top value=2pF
D41 "MMDL914-TP" SOD-323 177.724,162.77 r0 top
D42 "STPS160UY" SMB_ 177.385,132.29 r0 top
D43 "MMDL914-TP" SOD-323 164.755,141.75 r180 top
D44 "MMSZ5250BS-7-F" SOD-323 174.308,109.333 r90 top
D45 "ES1JAF" "DO-214AD (SMAF)" 164.564,100.565 r0 top value=15pF
D46 "1N4148W-7-F" SOD-123 156.413,110.471 r180 top value=2pF
D47 "MMDL914-TP" SOD-323 177.724,81.668 r0 top
D48 "STPS160UY" SMB_ 177.385,51.188 r0 top
D49 "MMDL914-TP" SOD-323 164.755,60.648 r180 top
D50 "MMSZ5250BS-7-F" SOD-323 174.308,28.231 r90 top
D51 "ES1JAF" "DO-214AD (SMAF)" 164.564,19.463 r0 top value=15pF
D52 "1N4148W-7-F" SOD-123 156.413,29.369 r180 top value=2pF
Designator26 "Comment" XSD366-094 235.154,286.722 r0 top
Designator26_1 "Comment" XSD366-094 235.154,205.62 r0 top
Designator26_1_1 "Comment" XSD366-094 235.154,124.518 r0 top
Designator26_1_1_1 "Comment" XSD366-094 235.154,43.415 r0 top
Designator27 "Comment" XSD366-094 235.154,313.367 r180 top
Designator27_1 "Comment" XSD366-094 235.154,232.264 r180 top
Designator27_1_1 "Comment" XSD366-094 235.154,151.162 r180 top
Designator27_1_1_1 "Comment" XSD366-094 235.154,70.06 r180 top
F1 "5A 250VAC" 37215000001 403.754,318.312 r180 top
F2 "37215000001" 37215000001 403.841,237.209 r180 top
F3 "37215000001" 37215000001 403.754,75.908 r180 top
F4 "37215000001" 37215000001 403.754,157.01 r180 top
J1 "DB128L-5.08-3P-OG-S" DB128L-5.08-3P-OG-S 73.711,306.43 r270 top
J2 "DB128L-5.08-3P-OG-S" DB128L-5.08-3P-OG-S 73.711,225.328 r270 top
J3 "DB128L-5.08-3P-OG-S" DB128L-5.08-3P-OG-S 73.711,144.225 r270 top
J4 "DB128L-5.08-3P-OG-S" DB128L-5.08-3P-OG-S 418.516,184.508 r90 top
J5 "DB128L-5.08-3P-OG-S" DB128L-5.08-3P-OG-S 73.711,63.123 r270 top
L1 "100uH" 7447021 324.51,284.711 r0 top
L2 "118uH" 760801401 303.816,314.241 r40 top locked
L3 "100uH" 7447021 324.51,203.609 r0 top
L4 "118uH" 760801401 303.903,233.138 r40 top locked
L5 "100uH" 7447021 324.51,42.307 r0 top
L6 "118uH" 760801401 303.816,70.934 r40 top locked
L7 "100uH" 7447021 324.51,123.41 r0 top
L8 "118uH" 760801401 303.816,152.036 r40 top locked
NT1 "Net Tie_SMD" "Net Tie Pad" 81.674,295.097 r180 top net-tie
NT2 "Net Tie_SMD" "Net Tie Pad" 81.674,213.995 r180 top net-tie
NT3 "Net Tie_SMD" "Net Tie Pad" 81.674,132.893 r180 top net-tie
NT4 "Net Tie_SMD" "Net Tie Pad" 81.674,51.79 r180 top net-tie
Q1 "STB26NM60N" TO-263 200.052,288.415 r0 top
Q2 "IPP60R099C7XKSA1" TO-220-3 235.242,283.033 r0 top
Q3 "SI2309CDS-T1-E3" SOT-23 197.055,275.181 r90 top
Q4 "MMBT4401-7-F" SOT-23 197.005,270.895 r90 top
Q5 "STB26NM60N" TO-263 200.052,207.313 r0 top
Q6 "IPP60R099C7XKSA1" TO-220-3 235.242,201.93 r0 top
Q7 "SI2309CDS-T1-E3" SOT-23 197.055,194.079 r90 top
Q8 "MMBT4401-7-F" SOT-23 197.005,189.792 r90 top
Q9 "STB26NM60N" TO-263 200.052,45.108 r0 top
Q10 "IPP60R099C7XKSA1" TO-220-3 235.242,39.726 r0 top
Q11 "SI2309CDS-T1-E3" SOT-23 197.055,31.874 r90 top
Q12 "MMBT4401-7-F" SOT-23 197.005,27.588 r90 top
Q13 "STB26NM60N" TO-263 200.052,126.21 r0 top
Q14 "IPP60R099C7XKSA1" TO-220-3 235.242,120.828 r0 top
Q15 "SI2309CDS-T1-E3" SOT-23 197.055,112.977 r90 top
Q16 "MMBT4401-7-F" SOT-23 197.005,108.69 r90 top
Q17 "CSD19502Q5B" VSON-CLIP-8(6x5) 105.665,324.661 r90 top
Q18 "FZT651TA" "SOT- 223" 179.083,273.438 r0 top
Q19 "CSD19502Q5B" VSON-CLIP-8(6x5) 105.69,287.338 r270 top
Q20 "CSD19502Q5B" VSON-CLIP-8(6x5) 105.665,243.609 r90 top
Q21 "FZT651TA" "SOT- 223" 179.083,192.336 r0 top
Q22 "CSD19502Q5B" VSON-CLIP-8(6x5) 105.69,206.236 r270 top
Q23 "CSD19502Q5B" VSON-CLIP-8(6x5) 105.665,162.507 r90 top
Q24 "FZT651TA" "SOT- 223" 179.083,111.233 r0 top
Q25 "CSD19502Q5B" VSON-CLIP-8(6x5) 105.69,125.133 r270 top
Q26 "CSD19502Q5B" VSON-CLIP-8(6x5) 105.665,81.405 r90 top
Q27 "FZT651TA" "SOT- 223" 179.083,30.131 r0 top
Q28 "CSD19502Q5B" VSON-CLIP-8(6x5) 105.69,44.031 r270 top
R1 "3.09MR" Res-1206 218.091,263.004 r90 top
R2 "1M" RES-0805 200.052,279.626 r180 top value=1MR
R3 "3.3MR" Res-1206 220.402,263.004 r270 top
R4 "3.09MR" Res-1206 218.091,257.551 r90 top
R5 "10R" Res-0603 238.523,256.679 r0 top
R6 "3.3MR" Res-1206 222.714,263.004 r90 top
R7 "3.3MR" Res-1206 218.091,252.826 r90 top
R8 "1R" Res-0603 238.523,255.384 r0 top
R9 "82.5K" Res-0603 235.242,278.968 r0 top
R10 "3.3MR" Res-1206 220.555,252.826 r270 top
R11 "36.5K" Res-0603 227.866,259.422 r180 top
R12 "120K" Res-0603 227.866,258.101 r180 top value=120kR
R13 "3K" Res-0603 227.866,256.659 r0 top value=3kR
R14 "10R" RES-0805 230.431,266.62 r270 top
R15 "24.3K" Res-0603 224.158,254.469 r90 top
R16 "100K" Res-0603 199.671,275.181 r90 top value=100kR
R17 "390K" Res-0603 227.124,262.089 r270 top value=390kR
R18 "75K" Res-0603 225.696,262.089 r270 top value=75kR
R19 "75K" Res-0603 203.835,270.133 r0 top value=75kR
R20 "140K" Res-0603 235.67,261.327 r0 top
R21 "130mR" Res-1206 244.187,267.248 r180 top
R22 "130mR" Res-1206 244.187,264.937 r180 top
R23 "150mR" Res-1206 244.187,262.625 r0 top
R24 "150mR" Res-1206 244.187,260.289 r0 top
R25 "390K" Res-0603 197.005,268.282 r0 top value=390kR
R26 "49K9" Res-0603 199.671,270.895 r270 top
R27 "3.09MR" Res-1206 218.091,181.901 r90 top
R28 "1M" RES-0805 200.052,198.524 r180 top value=1MR
R29 "3.3MR" Res-1206 220.402,181.901 r270 top
R30 "3.09MR" Res-1206 218.091,176.448 r90 top
R31 "10R" Res-0603 238.523,175.557 r0 top
R32 "3.3MR" Res-1206 222.714,181.901 r90 top
R33 "3.3MR" Res-1206 218.091,171.724 r90 top
R34 "1R" Res-0603 238.523,174.281 r0 top
R35 "82.5K" Res-0603 235.242,198.126 r0 top
R36 "3.3MR" Res-1206 220.555,171.724 r270 top
R37 "36.5K" Res-0603 227.866,178.32 r180 top
R38 "120K" Res-0603 227.866,176.999 r180 top value=120kR
R39 "3K" Res-0603 227.866,175.557 r0 top value=3kR
R40 "10R" RES-0805 230.431,185.517 r270 top
R41 "24.3K" Res-0603 224.158,173.367 r90 top
R42 "100K" Res-0603 199.671,194.079 r90 top value=100kR
R43 "390K" Res-0603 227.124,180.987 r270 top value=390kR
R44 "75K" Res-0603 225.696,180.987 r270 top value=75kR
R45 "75K" Res-0603 203.835,189.03 r0 top value=75kR
R46 "140K" Res-0603 235.67,180.225 r0 top
R47 "130mR" Res-1206 244.187,186.146 r180 top
R48 "130mR" Res-1206 244.187,183.834 r180 top
R49 "150mR" Res-1206 244.187,181.523 r0 top
R50 "150mR" Res-1206 244.187,179.186 r0 top
R51 "390K" Res-0603 197.005,187.179 r0 top value=390kR
R52 "49K9" Res-0603 199.671,189.792 r270 top
R53 "3.09MR" Res-1206 218.091,19.697 r90 top
R54 "1M" RES-0805 200.052,36.319 r180 top value=1MR
R55 "3.3MR" Res-1206 220.402,19.697 r270 top
R56 "3.09MR" Res-1206 218.091,14.243 r90 top
R57 "10R" Res-0603 238.523,13.352 r0 top
R58 "3.3MR" Res-1206 222.714,19.697 r90 top
R59 "3.3MR" Res-1206 218.091,9.519 r90 top
R60 "1R" Res-0603 238.523,12.077 r0 top
R61 "82.5K" Res-0603 235.242,35.648 r0 top
R62 "3.3MR" Res-1206 220.555,9.519 r270 top
R63 "36.5K" Res-0603 227.866,16.115 r180 top
R64 "120K" Res-0603 227.866,14.794 r180 top value=120kR
R65 "3K" Res-0603 227.866,13.352 r0 top value=3kR
R66 "10R" RES-0805 230.431,23.313 r270 top
R67 "24.3K" Res-0603 224.158,11.162 r90 top
R68 "100K" Res-0603 199.671,31.874 r90 top value=100kR
R69 "390K" Res-0603 227.124,18.782 r270 top value=390kR
R70 "75K" Res-0603 225.696,18.782 r270 top value=75kR
R71 "75K" Res-0603 203.835,26.826 r0 top value=75kR
R72 "140K" Res-0603 235.67,18.02 r0 top
R73 "130mR" Res-1206 244.187,23.941 r180 top
R74 "130mR" Res-1206 244.187,21.63 r180 top
R75 "150mR" Res-1206 244.187,19.318 r0 top
R76 "150mR" Res-1206 244.187,16.981 r0 top
R77 "390K" Res-0603 197.005,24.975 r0 top value=390kR
R78 "49K9" Res-0603 199.671,27.588 r270 top
R79 "3.09MR" Res-1206 218.091,100.799 r90 top
R80 "1M" RES-0805 200.052,117.422 r180 top value=1MR
R81 "3.3MR" Res-1206 220.402,100.799 r270 top
R82 "3.09MR" Res-1206 218.091,95.346 r90 top
R83 "10R" Res-0603 238.523,94.454 r0 top
R84 "3.3MR" Res-1206 222.714,100.799 r90 top
R85 "3.3MR" Res-1206 218.091,90.621 r90 top
R86 "1R" Res-0603 238.523,93.179 r0 top
R87 "82.5K" Res-0603 235.242,116.751 r0 top
R88 "3.3MR" Res-1206 220.555,90.621 r270 top
R89 "36.5K" Res-0603 227.866,97.218 r180 top
R90 "120K" Res-0603 227.866,95.897 r180 top value=120kR
R91 "3K" Res-0603 227.866,94.454 r0 top value=3kR
R92 "10R" RES-0805 230.431,104.415 r270 top
R93 "24.3K" Res-0603 224.158,92.265 r90 top
R94 "100K" Res-0603 199.671,112.977 r90 top value=100kR
R95 "390K" Res-0603 227.124,99.885 r270 top value=390kR
R96 "75K" Res-0603 225.696,99.885 r270 top value=75kR
R97 "75K" Res-0603 203.835,107.928 r0 top value=75kR
R98 "140K" Res-0603 235.67,99.123 r0 top
R99 "130mR" Res-1206 244.187,105.043 r180 top
R100 "130mR" Res-1206 244.187,102.732 r180 top
R101 "150mR" Res-1206 244.187,100.421 r0 top
R102 "150mR" Res-1206 244.187,98.084 r0 top
R103 "390K" Res-0603 197.005,106.077 r0 top value=390kR
R104 "49K9" Res-0603 199.671,108.69 r270 top
R105 "10R" Res-0603 177.724,323.349 r0 top
R106 "10K" RES-0805 177.724,321.673 r180 top
R107 "0R" Res-1206 181.067,289.77 r0 top value=0mR
R108 "26.1K" Res-0603 151.384,252.94 r180 top value=26.1kR
R109 "7.15K" Res-0603 177.94,268.282 r0 top
R110 "10R" Res-0603 164.755,305.581 r180 top
R111 "10K" RES-0805 164.755,307.257 r0 top
R112 "5.6K" RES-0805 154.502,252.94 r180 top value=5.6kR
R113 "10K" Res-0603 95.737,289.618 r180 top value=10kR
R114 "4.99K" Res-0603 95.793,325.406 r180 top
R115 "0R" Res-0402 90.5,289.364 r270 top
R116 "0R" Res-0402 90.602,325.152 r270 top
R117 "1.65K" Res-1206 340.309,280.702 r270 top
R118 "1.65K" Res-1206 338.061,280.702 r90 top
R119 "1.65K" Res-1206 335.813,280.702 r270 top
R120 "2.2R" Res-0603 168.326,261.442 r90 top
R121 "4.99MR" Res-1206 174.295,260.111 r0 top
R122 "4.99MR" Res-1206 174.295,257.863 r180 top
R123 "274K" Res-0603 160.99,252.943 r0 top
R124 "4.99MR" Res-1206 174.295,255.615 r0 top
R125 "100R" Res-0603 147.189,257.69 r90 top
R126 "301K" res-0603 158.274,252.94 r0 top
R127 "37.4K" Res-0603 112.463,262.467 r90 top
R128 "44.2K" Res-0603 149.475,262.262 r0 top
R129 "0R" Res-0603 135.89,258.579 r180 top
R130 "324K" Res-0603 114.423,259.287 r90 top value=324kR
R131 "324K" Res-0603 119.456,263.07 r0 top value=324kR
R132 "20R" Res-0603 123.698,263.095 r0 top
R133 "20K" Res-1206 122.936,259.849 r270 top
R134 "12.4K" Res-0603 128.067,263.095 r180 top value=12.4kR
R135 "10R" Res-0603 177.724,242.247 r0 top
R136 "10K" RES-0805 177.724,240.57 r180 top
R137 "0R" Res-1206 181.067,208.668 r0 top value=0mR
R138 "26.1K" Res-0603 151.384,171.844 r180 top value=26.1kR
R139 "7.15K" Res-0603 177.94,187.179 r0 top
R140 "10R" Res-0603 164.755,224.478 r180 top
R141 "10K" RES-0805 164.755,226.155 r0 top
R142 "5.6K" RES-0805 154.502,171.844 r180 top value=5.6kR
R143 "10K" Res-0603 95.737,208.515 r180 top value=10kR
R144 "4.99K" Res-0603 95.793,244.304 r180 top
R145 "0R" Res-0402 90.5,208.261 r270 top
R146 "0R" Res-0402 90.602,244.05 r270 top
R147 "1.65K" Res-1206 340.309,199.6 r270 top
R148 "1.65K" Res-1206 338.061,199.6 r90 top
R149 "1.65K" Res-1206 335.813,199.6 r270 top
R150 "2.2R" Res-0603 168.326,180.404 r90 top
R151 "4.99MR" Res-1206 174.295,179.015 r0 top
R152 "4.99MR" Res-1206 174.295,176.767 r180 top
R153 "274K" Res-0603 160.99,171.847 r0 top
R154 "4.99MR" Res-1206 174.295,174.519 r0 top
R155 "100R" Res-0603 147.189,176.594 r90 top
R156 "301K" res-0603 158.274,171.844 r0 top
R157 "37.4K" Res-0603 112.462,181.364 r90 top
R158 "44.2K" Res-0603 149.475,181.166 r0 top
R159 "0R" Res-0603 135.89,177.476 r180 top
R160 "324K" Res-0603 114.423,178.185 r90 top value=324kR
R161 "324K" Res-0603 119.456,181.967 r0 top value=324kR
R162 "20R" Res-0603 123.698,181.993 r0 top
R163 "20K" Res-1206 122.936,178.746 r270 top
R164 "12.4K" Res-0603 128.067,181.993 r180 top value=12.4kR
R165 "10R" Res-0603 177.724,161.144 r0 top
R166 "10K" RES-0805 177.724,159.468 r180 top
R167 "0R" Res-1206 181.067,127.566 r0 top value=0mR
R168 "26.1K" Res-0603 151.384,90.736 r180 top value=26.1kR
R169 "7.15K" Res-0603 177.94,106.077 r0 top
R170 "10R" Res-0603 164.755,143.376 r180 top
R171 "10K" RES-0805 164.755,145.052 r0 top
R172 "5.6K" RES-0805 154.502,90.736 r180 top value=5.6kR
R173 "10K" Res-0603 95.737,127.413 r180 top value=10kR
R174 "4.99K" Res-0603 95.793,163.202 r180 top
R175 "0R" Res-0402 90.546,127.159 r270 top
R176 "0R" Res-0402 90.602,162.948 r270 top
R177 "1.65K" Res-1206 340.385,119.401 r270 top
R178 "1.65K" Res-1206 338.15,119.401 r90 top
R179 "1.65K" Res-1206 335.915,119.401 r270 top
R180 "2.2R" Res-0603 168.326,99.295 r90 top
R181 "4.99MR" Res-1206 174.295,97.906 r0 top
R182 "4.99MR" Res-1206 174.295,95.658 r180 top
R183 "274K" Res-0603 160.99,90.739 r0 top
R184 "4.99MR" Res-1206 174.295,93.41 r0 top
R185 "100R" Res-0603 147.189,95.485 r90 top
R186 "301K" res-0603 158.274,90.736 r0 top
R187 "37.4K" Res-0603 112.462,100.262 r90 top
R188 "44.2K" Res-0603 149.475,100.057 r0 top
R189 "0R" Res-0603 135.89,96.374 r180 top
R190 "324K" Res-0603 114.423,97.082 r90 top value=324kR
R191 "324K" Res-0603 119.456,100.865 r0 top value=324kR
R192 "20R" Res-0603 123.698,100.89 r0 top
R193 "20K" Res-1206 122.936,97.644 r270 top
R194 "12.4K" Res-0603 128.067,100.89 r180 top value=12.4kR
R195 "10R" Res-0603 177.724,80.042 r0 top
R196 "10K" RES-0805 177.724,78.366 r180 top
R197 "0R" Res-1206 181.067,46.463 r0 top value=0mR
R198 "26.1K" Res-0603 151.384,9.633 r180 top value=26.1kR
R199 "7.15K" Res-0603 177.94,24.975 r0 top
R200 "10R" Res-0603 164.755,62.274 r180 top
R201 "10K" RES-0805 164.755,63.95 r0 top
R202 "5.6K" RES-0805 154.502,9.633 r180 top value=5.6kR
R203 "10K" Res-0603 95.731,46.296 r180 top value=10kR
R204 "4.99K" Res-0603 95.793,82.099 r180 top
R205 "0R" Res-0402 90.545,46.042 r270 top
R206 "0R" Res-0402 90.602,81.845 r270 top
R207 "1.65K" Res-1206 340.385,38.298 r270 top
R208 "1.65K" Res-1206 338.137,38.298 r90 top
R209 "1.65K" Res-1206 335.915,38.298 r270 top
R210 "2.2R" Res-0603 168.326,18.193 r90 top
R211 "4.99MR" Res-1206 174.295,16.804 r0 top
R212 "4.99MR" Res-1206 174.295,14.556 r180 top
R213 "274K" Res-0603 160.99,9.636 r0 top
R214 "4.99MR" Res-1206 174.295,12.308 r0 top
R215 "100R" Res-0603 147.189,14.383 r90 top
R216 "301K" res-0603 158.274,9.633 r0 top
R217 "37.4K" Res-0603 112.462,19.159 r90 top
R218 "44.2K" Res-0603 149.475,18.955 r0 top
R219 "0R" Res-0603 135.89,15.272 r180 top
R220 "324K" Res-0603 114.423,15.98 r90 top value=324kR
R221 "324K" Res-0603 119.456,19.762 r0 top value=324kR
R222 "20R" Res-0603 123.698,19.788 r0 top
R223 "20K" Res-1206 122.936,16.541 r270 top
R224 "12.4K" Res-0603 128.067,19.788 r180 top value=12.4kR
RT1 "B57236S0100M000" B57236S0100M000 209.323,284.387 r90 top
RT2 "B57236S0100M000" B57236S0100M000 209.323,203.284 r90 top
RT3 "B57236S0100M000" B57236S0100M000 209.323,41.08 r90 top
RT4 "B57236S0100M000" B57236S0100M000 209.323,122.182 r90 top
T1 "744822301" 744822301 384.61,301.485 r90 top
T2 "744824310" 744824310 357.347,301.498 r90 top value=10mH
T3 "744822301" 744822301 384.61,220.383 r90 top
T4 "744824310" 744824310 357.347,220.395 r90 top value=10mH
T5 "744822301" 744822301 384.61,59.081 r90 top
T6 "744824310" 744824310 357.347,59.094 r90 top value=10mH
T7 "744822301" 744822301 384.61,140.183 r90 top
T8 "744824310" 744824310 357.347,140.196 r90 top value=10mH
T9 "760895741" 760895741 132.865,306.08 r0 top value=400uH
T10 "760895741" 760895741 132.865,224.978 r0 top value=400uH
T11 "760895741" 760895741 132.865,143.875 r0 top value=400uH
T12 "760895741" 760895741 132.865,62.773 r0 top value=400uH
U1 "UCC28056DBVT" SOT-23-6 231.879,256.659 r0 top
U2 "UCC28056DBVT" SOT-23-6 231.879,175.557 r0 top
U3 "UCC28056DBVT" SOT-23-6 231.879,13.352 r0 top
U4 "UCC28056DBVT" SOT-23-6 231.879,94.454 r0 top
U5 "IPB65R150CFDA" TO-263 177.724,313.037 r180 top
U6 "IPB65R150CFDA" TO-263 164.755,315.893 r0 top
U7 "UCC24612-2DBVR" SOT-23-5 93.675,287.052 r0 top
U8 "UCC24612-2DBVR" SOT-23-5 93.731,322.841 r0 top
U9 "UCC256404DDBR" UCC256404DDBR 156.261,260.357 r0 top
U10 "ATL432LIAQDBZRQ1" SOT-23 115.373,262.467 r0 top
U11 "VO618A-3" DIP-4 129.311,259.844 r0 top
U12 "IPB65R150CFDA" TO-263 177.724,231.934 r180 top
U13 "IPB65R150CFDA" TO-263 164.755,234.791 r0 top
U14 "UCC24612-2DBVR" SOT-23-5 93.675,205.95 r0 top
U15 "UCC24612-2DBVR" SOT-23-5 93.731,241.739 r0 top
U16 "UCC256404DDBR" UCC256404DDBR 156.261,179.261 r0 top
U17 "ATL432LIAQDBZRQ1" SOT-23 115.373,181.364 r0 top
U18 "VO618A-3" DIP-4 129.311,178.741 r0 top
U19 "IPB65R150CFDA" TO-263 177.724,150.832 r180 top
U20 "IPB65R150CFDA" TO-263 164.755,153.688 r0 top
U21 "UCC24612-2DBVR" SOT-23-5 93.675,124.848 r0 top
U22 "UCC24612-2DBVR" SOT-23-5 93.731,160.636 r0 top
U23 "UCC256404DDBR" UCC256404DDBR 156.261,98.152 r0 top
U24 "ATL432LIAQDBZRQ1" SOT-23 115.373,100.262 r0 top
U25 "VO618A-3" DIP-4 129.311,97.639 r0 top
U26 "IPB65R150CFDA" TO-263 177.724,69.73 r180 top
U27 "IPB65R150CFDA" TO-263 164.755,72.586 r0 top
U28 "UCC24612-2DBVR" SOT-23-5 93.673,43.731 r0 top
U29 "UCC24612-2DBVR" SOT-23-5 93.731,79.534 r0 top
U30 "UCC256404DDBR" UCC256404DDBR 156.261,17.05 r0 top
U31 "ATL432LIAQDBZRQ1" SOT-23 115.373,19.159 r0 top
U32 "VO618A-3" DIP-4 129.311,16.537 r0 top
VR1 "B72210S2271K101" B72210S2271K101 403.088,301.495 r270 top value=195pF
VR2 "B72210S2271K101" B72210S2271K101 403.175,220.392 r270 top value=195pF
VR3 "B72210S2271K101" B72210S2271K101 403.088,59.091 r270 top value=195pF
VR4 "B72210S2271K101" B72210S2271K101 403.088,140.194 r270 top value=195pF

## Footprints (in the part's own frame and the unit in brackets; to place one, negate y for a bottom-side part, rotate by r counter-clockwise, add the part's x,y. Pads: shape width x height; smd on the part's side, far side on the other; paste and mask are expansions set on the pad)
50SVPF10M [mm]
  rect 3.5x1.6 smd: 1(-2.8,0) 2(2.8,0)
  silkscreen extent -4.01,-3.3 3.3,3.3, body extent -3.65,-3.3 3.65,3.3, height 5.9
450MPK474J [mm]
  round 1.8 hole 1.092 paste-2539.97 mask+0: 1(-7.5,0) 2(7.5,0)
  silkscreen extent -9.06,-3.3 9.06,3.3, body extent -9,-3.25 9,3.25, height 11.8
7447021 [mm]
  round 1.6 hole 0.82: 1(0,4.5) 2(0,-4.5)
  silkscreen extent -8.25,-4.78 8.25,4.8, body extent -8.21,-4.75 8.21,4.75, height 16.41
744822301 [mm]
  round 2.2 hole 1.1: 1(-3.85,-2.5) 2(3.85,-2.5) 3(3.85,2.5) 4(-3.85,2.5)
  silkscreen extent -7.81,-5.43 7.81,5.43, body extent -7.76,-5.4 7.76,5.37, height 19.6
744824310 [mm]
  round 2.5 hole 1.3: 1(-5,-6) 2(5,-6) 3(5,6) 4(-5,6)
  silkscreen extent -12.45,-8.53 12.42,8.59, body extent -12.4,-8.5 12.4,8.53, height 29.58
760801401 [mm]
  rect 7x3 hole 1.5 square: 1(0,0) 2(-14.95,-3)
  round 0 hole 4.4 unplated: M1(-21.95,-1.5)
  silkscreen extent -48.45,-28 4.55,25, body extent -46.09,-25.64 5.01,22.54, height 27.69
760895741 [mm]
  rect 2.4x2.4 hole 1.2: 1(-17.5,17.5)
  round 2.4 hole 1.2: 2(-17.5,12.5) 3(-17.5,7.5) 4(-17.5,2.5) 5(-17.5,-2.5) 6(-17.5,-7.5) 7(-17.5,-12.5) 8(-17.5,-17.5) 9(17.5,-17.5) 10(17.5,-12.5) 11(17.5,-7.5) 12(17.5,-2.5) 13(17.5,2.5) 14(17.5,7.5) 15(17.5,12.5) 16(17.5,17.5)
  Keep-Out Layer board cut-out: -1.8,14.25 -5.3,14.25 -5.3,-14.25 -1.8,-14.25
  silkscreen extent -23.42,-22.12 23.42,22.12, body extent -23.3,-22 23.3,22, height 26.85
37215000001 [mm]
  round 2 hole 1.2 paste-2539.97 mask+0.051: 1(-2.54,0) 2(2.54,0)
  silkscreen extent -4.3,-4.3 4.3,4.3, body extent -4.2,-4.19 4.2,4.19, height 8
890324024005 [mm]
  rect 1.8x1.8 hole 0.92: 1(-6.25,0)
  round 1.8 hole 0.92: 2(6.25,0)
  silkscreen extent -7.5,-5 7.5,5, body extent -7.5,-5 7.5,5, height 16.2
B57236S0100M000 [mm]
  rect 1.7x1.7 hole 0.85: 1(0,0)
  round 1.7 hole 0.85: 2(5,0)
  silkscreen extent -3.25,-2.5 8.25,2.5, body extent -3.25,-3 8.25,3, height 15.98
B72210S2271K101 [mm]
  round 2 hole 1.2 paste-2539.97 mask+0.051: 1(-3.749,0.899) 2(3.749,-0.899)
  silkscreen extent -6.27,-2.72 6.25,2.7, body extent -6.25,-2.7 6.25,2.7, height 13.35
Cap-0402 [mil]
  rect 18x25 smd mask+2.36: 1(-18.5,0) 2(18.5,0)
  silkscreen extent -31,-16 31,16, body extent -20,-10 20,10, height 19
Cap-0603 [mil]
  rect 30x35 smd mask+2.36: 1(-30,0) 2(30,0)
  silkscreen extent -49,-21 49,21, body extent -32,-16 31,16, height 34
CAP-0603 [mil]
  rect 30x35 smd mask+2.36: 1(-30,0) 2(30,0)
  silkscreen extent -49,-21 49,21, body extent -32,-16 31,16, height 34
Cap-1206 [mil] "SMD 1206"
  rect 60x70 smd: 1(-50,0) 2(50,0)
  silkscreen extent -84,-39 84,39, body extent -63,-31 63,32, height 39
DB128L-5.08-3P-OG-S [mm]
  rect 2.4x2.4 hole 1.6 paste-2539.97 mask+0.051: 1(-5.08,0)
  round 2.4 hole 1.6 paste-2539.97 mask+0.051: 2(0,0) 3(5.08,0)
  silkscreen extent -7.62,-5.1 8.12,5, body extent -7.62,-4.99 8.22,5.01, height 13.97
DE1B3RA101KN4AN01F [mm]
  rect 1.3x1.3 hole 0.8: 1(-5,0)
  round 1.3 hole 0.8: 2(5,0)
  silkscreen extent -3,-2 3,2, body extent -5.5,-2 5.5,2, height 3.75
DE1B3RA221KN4AN01F [mm]
  rect 1.3x1.3 hole 0.8: 1(-5,0)
  round 1.3 hole 0.8: 2(5,0)
  silkscreen extent -3,-2 3,2, body extent -5.5,-2 5.5,2, height 3.75
DE1E3RA222MA4BN01F [mm]
  round 1.6 hole 1.1 paste-2539.97 mask+0.051: 1(-5,0) 2(5,0)
  silkscreen extent -4.5,-2.5 4.5,2.5, body extent -5.34,-2.53 5.34,2.47, height 13
DIP-4 [mm]
  rect 1.8x1.8 hole 1 paste-2539.97 mask+0.051: 1(-3.81,1.265)
  round 1.8 hole 1 copper offset 0,0 paste-2539.97 mask+0.051: 2(-3.81,-1.275) 3(3.81,-1.265) 4(3.81,1.275)
  silkscreen extent -4.98,-2.28 2.53,2.29, body extent -3.91,-2.3 3.91,2.3, height 4.29
"DO-214AD (SMAF)" [mm]
  rect 1.34x1.9 smd paste+0 mask+0.051: 1(-2.08,0) 2(2.08,0)
  silkscreen extent -3.28,-1.3 1.75,1.3, body extent -2.35,-1.25 2.35,1.25, height 1
EEU-FR1V681B [mm]
  rect 1.2x1.2 hole 0.85: 1(-2.5,0)
  round 1.2 hole 0.85: 2(2.5,0)
  silkscreen extent -5,-5 5.03,5, body extent -5,-5 5,5, height 20
EEUFR1V471B [mm]
  round 1.6 hole 1 paste-2539.97 mask+0.05: 1(-2.5,0) 2(2.5,0)
  silkscreen extent -5,-5 5,5, body extent -4.99,-5 5,5, height 24.91
GBU [mm]
  oval 3x1.4 hole 0.7 slot 2.2 at 0 deg paste-2539.97 mask+0.051: 1(-7.62,0) 2(-2.54,0) 3(2.54,0) 4(7.62,0)
  silkscreen extent -10.8,-2.28 10.79,1.25, body extent -10.75,-2.26 10.75,1.2, height 19.9
KN151M45025*30A [mm]
  round 3.8 hole 2.3 paste-2539.97 mask+0.05: 1(-5,0) 2(5,0)
  silkscreen extent -12.58,-12.5 12.42,12.5, body extent -12.51,-12.49 12.5,12.5, height 40.01
KP223J2J0701 [mm]
  rect 1.8x1.8 hole 0.914 paste-2539.97 mask+0.051: 1(-3.75,0)
  round 1.8 hole 0.914 paste-2539.97 mask+0.051: 2(3.75,0)
  silkscreen extent -4.5,-2.25 4.5,2.25, body extent -4.5,-2.2 4.5,2.2, height 11.57
MPP105J2W10KN22605 [mil]
  round 60 hole 36 paste-99999 mask+1.97: 1(-196.85,0) 2(196.85,0)
  silkscreen extent -239,-142 239,142, body extent -236,-140 236,140, height 673
"Net Tie Pad" [mil]
  rect 18x25 smd mask-10: 1(-18.5,0) 2(18.5,0)
  Top Layer region: -15,-234.01 15,-234.01 15,394.99 -15,394.99
RC035M331LO8*14TH-2A1E [mm]
  round 1.6 hole 1 paste-2539.97 mask+0.051: 1(-1.75,0) 2(1.75,0)
  silkscreen extent -3.96,-4 4.04,4, body extent -4,-4.01 4,4, height 8
Res-0402 [mil]
  rect 18x25 smd mask+2.17: 1(-18.5,0) 2(18.5,0)
  silkscreen extent -32,-17 32,16, body extent -23,-11 23,11, height 16
Res-0603 [mil]
  rect 30x35 smd: 1(-30,0) 2(30,0)
  silkscreen extent -48,-21 48,21, body extent -31,-17 31,17, height 18
res-0603 [mil]
  rect 30x35 smd: 1(-30,0) 2(30,0)
  silkscreen extent -48,-21 48,21, body extent -31,-17 31,17, height 18
RES-0805 [mil] "SMD 0805"
  rect 40x50 smd: 1(-40,0) 2(40,0)
  silkscreen extent -64,-29 64,29, body extent -39,-25 39,24, height 24
Res-1206 [mil]
  rect 60x70 smd: 1(-50,0) 2(50,0)
  silkscreen extent -84,-39 84,39, body extent -63,-31 63,31, height 24
SMA [mm]
  rect 2.5x1.7 smd: 1(-2,0) 2(2,0)
  silkscreen extent -4.44,-1.42 2.06,1.42, body extent -2.6,-1.3 2.6,1.3, height 2.4
SMB_ [mm]
  rect 2.8x2.4 smd: 1(-2.3,0) 2(2.3,0)
  silkscreen extent -2.21,-1.91 4.83,1.9, body extent -2.7,-1.8 2.7,1.8, height 2.3
SOD-123 [mm]
  rect 0.95x0.9 smd: 1(-1.575,0) 2(1.575,0)
  silkscreen extent -1.37,-0.8 2.82,0.8, body extent -1.82,-0.78 1.83,0.78, height 1.5
SOD-323 [mm]
  rect 0.8x0.9 smd mask+0.055: 1(-1.15,0) 2(1.15,0)
  silkscreen extent -2.01,-0.79 0.94,0.79, body extent -1.3,-0.67 1.3,0.67, height 1.1
SOT-23 [mm] "TRANS NPN 40V 0.6A SOT23"
  rect 0.82x0.92 smd: 1(-0.95,-1) 2(0.95,-1) 3(0,1)
  silkscreen extent -1.68,-1.3 1.55,0.81, body extent -1.5,-1.25 1.5,1.25, height 1.05
SOT-23-5 [mm]
  rect 1.1x0.6 smd: 1(-1.3,0.95) 2(-1.3,0) 3(-1.3,-0.95) 4(1.3,-0.95) 5(1.3,0.95)
  silkscreen extent -2.13,-1.5 0.88,1.5, body extent -1.4,-1.45 1.4,1.45, height 1.45
SOT-23-6 [mm]
  rect 1.22x0.62 smd: 1(-1.31,0.95) 2(-1.31,0) 3(-1.31,-0.95) 4(1.31,-0.95) 5(1.31,0) 6(1.31,0.95)
  silkscreen extent -2.18,-1.52 0.86,1.52, body extent -1.5,-1.5 1.5,1.5, height 1.47
"SOT- 223" [mm]
  rect 1.5x2 smd: 1(-2.3,-3.05) 2(0,-3.05) 3(2.3,-3.05)
  rect 3.8x2 smd: 4(0,3.05)
  silkscreen extent -3.35,-3.2 3.3,1.8, body extent -3.25,-3.5 3.25,3.5, height 1.61
TO-220-2 [mm]
  rect 2x2.5 hole 1.4 paste-2539.97 mask+0.051: 1(-2.54,0)
  oval 2x2.5 hole 1.4 paste-2539.97 mask+0.051: 2(2.54,0)
  silkscreen extent -5.35,-2.06 5.35,3.13, body extent -5.33,-1.71 5.33,3.1, height 22.95
TO-220-3 [mm]
  rect 2x2 hole 1.2 paste-2539.97 mask+0.051: 1(-2.54,0)
  round 2 hole 1.2 paste-2539.97 mask+0.051: 2(0,0) 3(2.54,0)
  silkscreen extent -5,-2.49 5.03,2.72, body extent -5.05,-1.75 5.05,2.75, height 14.9
TO-263 [mm]
  rect 2.08x3.81 smd: 1(-2.54,-5.335) 3(2.54,-5.335)
  rect 11.43x8.89 smd: 2(0,5.335)
  silkscreen extent -5.21,-5.46 5.11,0.51, body extent -5.08,-6.6 5.02,8.79, height 4.5
UCC256404DDBR [mm]
  rect 1.55x0.6 smd paste+0 mask+0.05: 1(-2.775,4.445) 3(-2.775,1.905) 4(-2.775,0.635) 5(-2.775,-0.635) 6(-2.775,-1.905) 7(-2.775,-3.175) 8(-2.775,-4.445) 9(2.775,-4.445) 10(2.775,-3.175) 11(2.775,-1.905) 12(2.775,-0.635) 14(2.775,1.905) 15(2.775,3.175) 16(2.775,4.445)
  silkscreen extent -3.82,-4.9 1.8,4.9, body extent -3,-4.95 3,4.95, height 1.75
VSON-CLIP-8(6x5) [mm]
  rect 1.27x0.7 smd paste-100 mask+0.051: 1(-3,1.904) 2(-3,0.636) 3(-3,-0.636) 4(-3,-1.906)
  rect 1x0.7 smd paste-100 mask+0.051: 5(3,-1.904) 6(3,-0.634) 7(3,0.636) 8(3,1.906)
  rect 4.5x4.9 smd paste-100 mask+0.051: 8(0.39,0.001)
  silkscreen extent -3.91,-2.57 3,2.55, body extent -3,-2.45 3,2.45, height 1.1
X2P2224KN1B0130150080ES0 [mm]
  round 2 hole 1.2 paste-2539.97 mask+0.05: 1(-5,0) 2(5,0)
  silkscreen extent -6.5,-4 6.5,4, body extent -6.5,-4 6.5,4, height 15
XSD366-094 [mm]
  round 4 hole 2.4 paste-2539.97 mask+0.102: 1(-12.75,0) 2(12.75,0)
  silkscreen extent -21,-12.5 21,12.5, body extent -21.31,-12.76 21.31,12.76, height 25.3

## Part data
C1 C11 C24 C34 C47 C57 C70 C80: library part DE1B3RA101KN4AN01F, "CAP CER 100PF 250V RADIAL", LCSC Part Number=C3285641, Manufacturer=Murata, ComponentLink1Description=https://search.murata.co.jp/Ceramy/image/img/A01X/G101/ENG/DE1_RA_N01F_E.pdf?src-supplier=Digikey, ComponentLink1URL=https://search.murata.co.jp/Ceramy/image/img/A01X/G101/ENG/DE1_RA_N01F_E.pdf?src-supplier=Digikey, Height=9mm, Item Type=Capacitors, Manufacturer Part Number=DE1B3RA101KN4AN01F, Material=4241ConductorMaterial, Pricing="1=0.3, 10=0.147, 50=0.147, 100=0.123, 1000=0.089, 10000=0.061 (USD)", RoHS=Yes, Stock=583, Supplier=Mouser
C2 C3 C9 C10 C25 C26 C32 C33 C48 C49 C55 C56 C71 C72 C78 C79: library part DE1B3RA221KN4AN01F, "CAP CER 220PF 250V RADIAL", LCSC Part Number=C1622503, Manufacturer=Murata, ComponentLink1Description=https://search.murata.co.jp/Ceramy/image/img/A01X/G101/ENG/DE1_RA_N01F_E.pdf?src-supplier=Digikey, ComponentLink1URL=https://search.murata.co.jp/Ceramy/image/img/A01X/G101/ENG/DE1_RA_N01F_E.pdf?src-supplier=Digikey, Item Type="Suppression Capacitor", Manufacturer Part Number=DE1B3RA221KN4AN01F, Pricing="1=0.35, 10=0.168, 50=0.168, 100=0.141, 1000=0.107, 10000=0.069 (USD)", RoHS=Yes, Stock=985, Supplier=Mouser
C4 C27 C50 C73: library part 450MPK474J, "CAP FILM 0.47UF 5% 450VDC RADIAL", Case/Package=Radial, Dielectric Material=Polypropylene, LCSC Part Number=C2798220, Manufacturer=Rubycon, Max Operating Temperature=105°C, Min Operating Temperature=-40°C, Package Quantity=1, Tolerance=5%, Voltage Rating (DC)=450V, ComponentLink1Description=https://datasheet.ciiva.com/6281/e-mpk-6281321.pdf?src-supplier=Digikey, ComponentLink1URL=https://datasheet.ciiva.com/6281/e-mpk-6281321.pdf?src-supplier=Digikey, ComponentLink2Description=https://datasheet.ciiva.com/15021/e-mpk-15021932.pdf?src-supplier=Digikey, ComponentLink2URL=https://datasheet.ciiva.com/15021/e-mpk-15021932.pdf?src-supplier=Digikey, Height - Seated (Max)=0.433inch, Item Type="Film Capacitors", Lead Pitch=0.591inch, Length=0.709inch, Manufacturer Part Number=450MPK474J, Mounting Technology="Through Hole", Packaging="Cut Tape", Pricing="1=0.84, 10=0.605, 100=0.4311, 4000=0.26942, 8000=0.25962, 12000=0.25531 (USD)", RoHS=Yes, RoHS Compliant=Yes, Series=MPK, Stock=4083, Supplier=Digikey, Termination="PC Pins", Width=0.256inch
C5 C28 C51 C74: "1uF -40℃~+105℃ ±5% 450V Plugin,P=10mm Polypropylene Film Capacitors (CBB) ROHS", LCSC Part Number=C2686214, Manufacturer=KNSCHA, Item Type=Capacitor, Manufacturer Part Number=MPP105J2W10KN22605, RoHS=No, Supplier=LCSC
C6 C29 C52 C75: library part X2P2224KN1B0130150080ES0, "220nF ±10% X2 275V Plugin,P=10mm Suppression Capacitors ROHS", LCSC Part Number=C286022, Manufacturer=STE, Package=Plugin,P=10mm, ComponentLink1Description=LCSC, ComponentLink1URL=https://www.lcsc.com/product-detail/Suppression-Capacitors_STE-Songtian-Elec-X2P2224KN1B0130150080ES0_C286022.html, Item Type="Suppression Capacitor", Manufacturer Part Number=X2P2224KN1B0130150080ES0